# Altium PCB board_a.pcbdoc
Units mil, origin at the board's own origin, x right, y up, seen from the top; angles counter-clockwise.
Board outline 3937.01 x 4409.45 mil, 4 copper layers (Top Layer, In1.Cu, In2.Cu, Bottom Layer), stack 2.757 mil thick; 194 components, 98 nets, 535 pads, 281 vias.
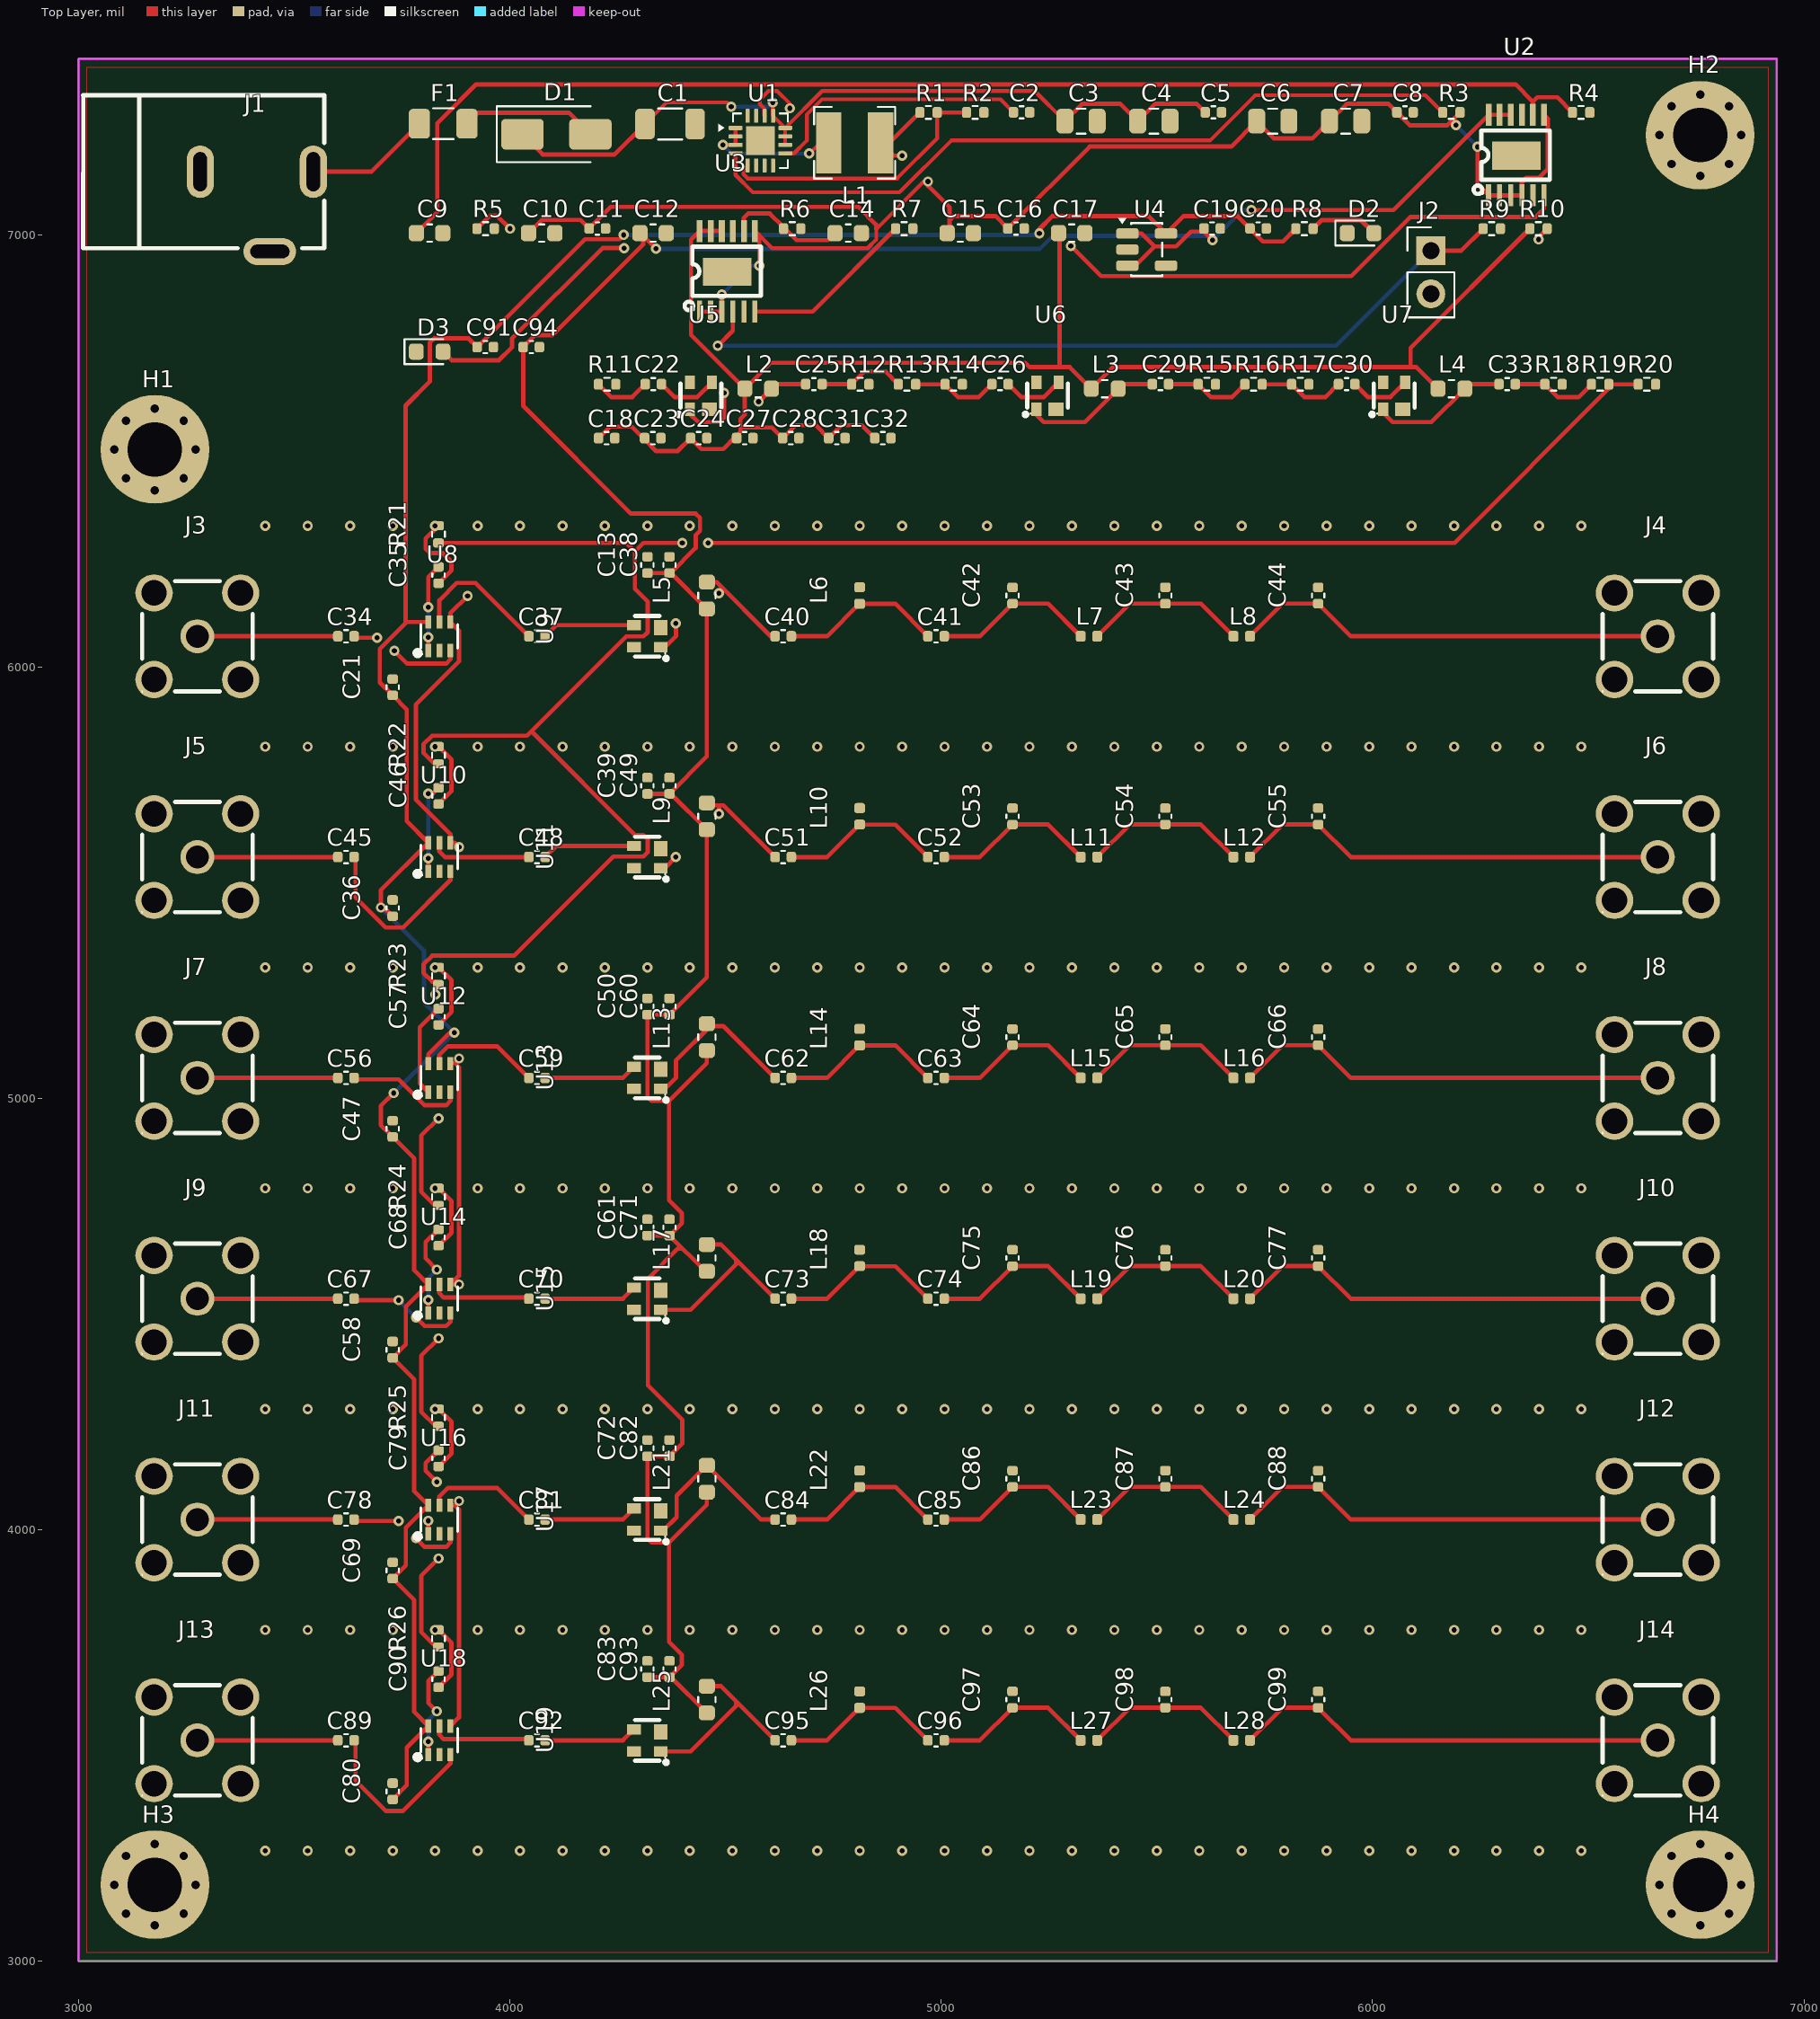
[diagram p0: Top Layer view]
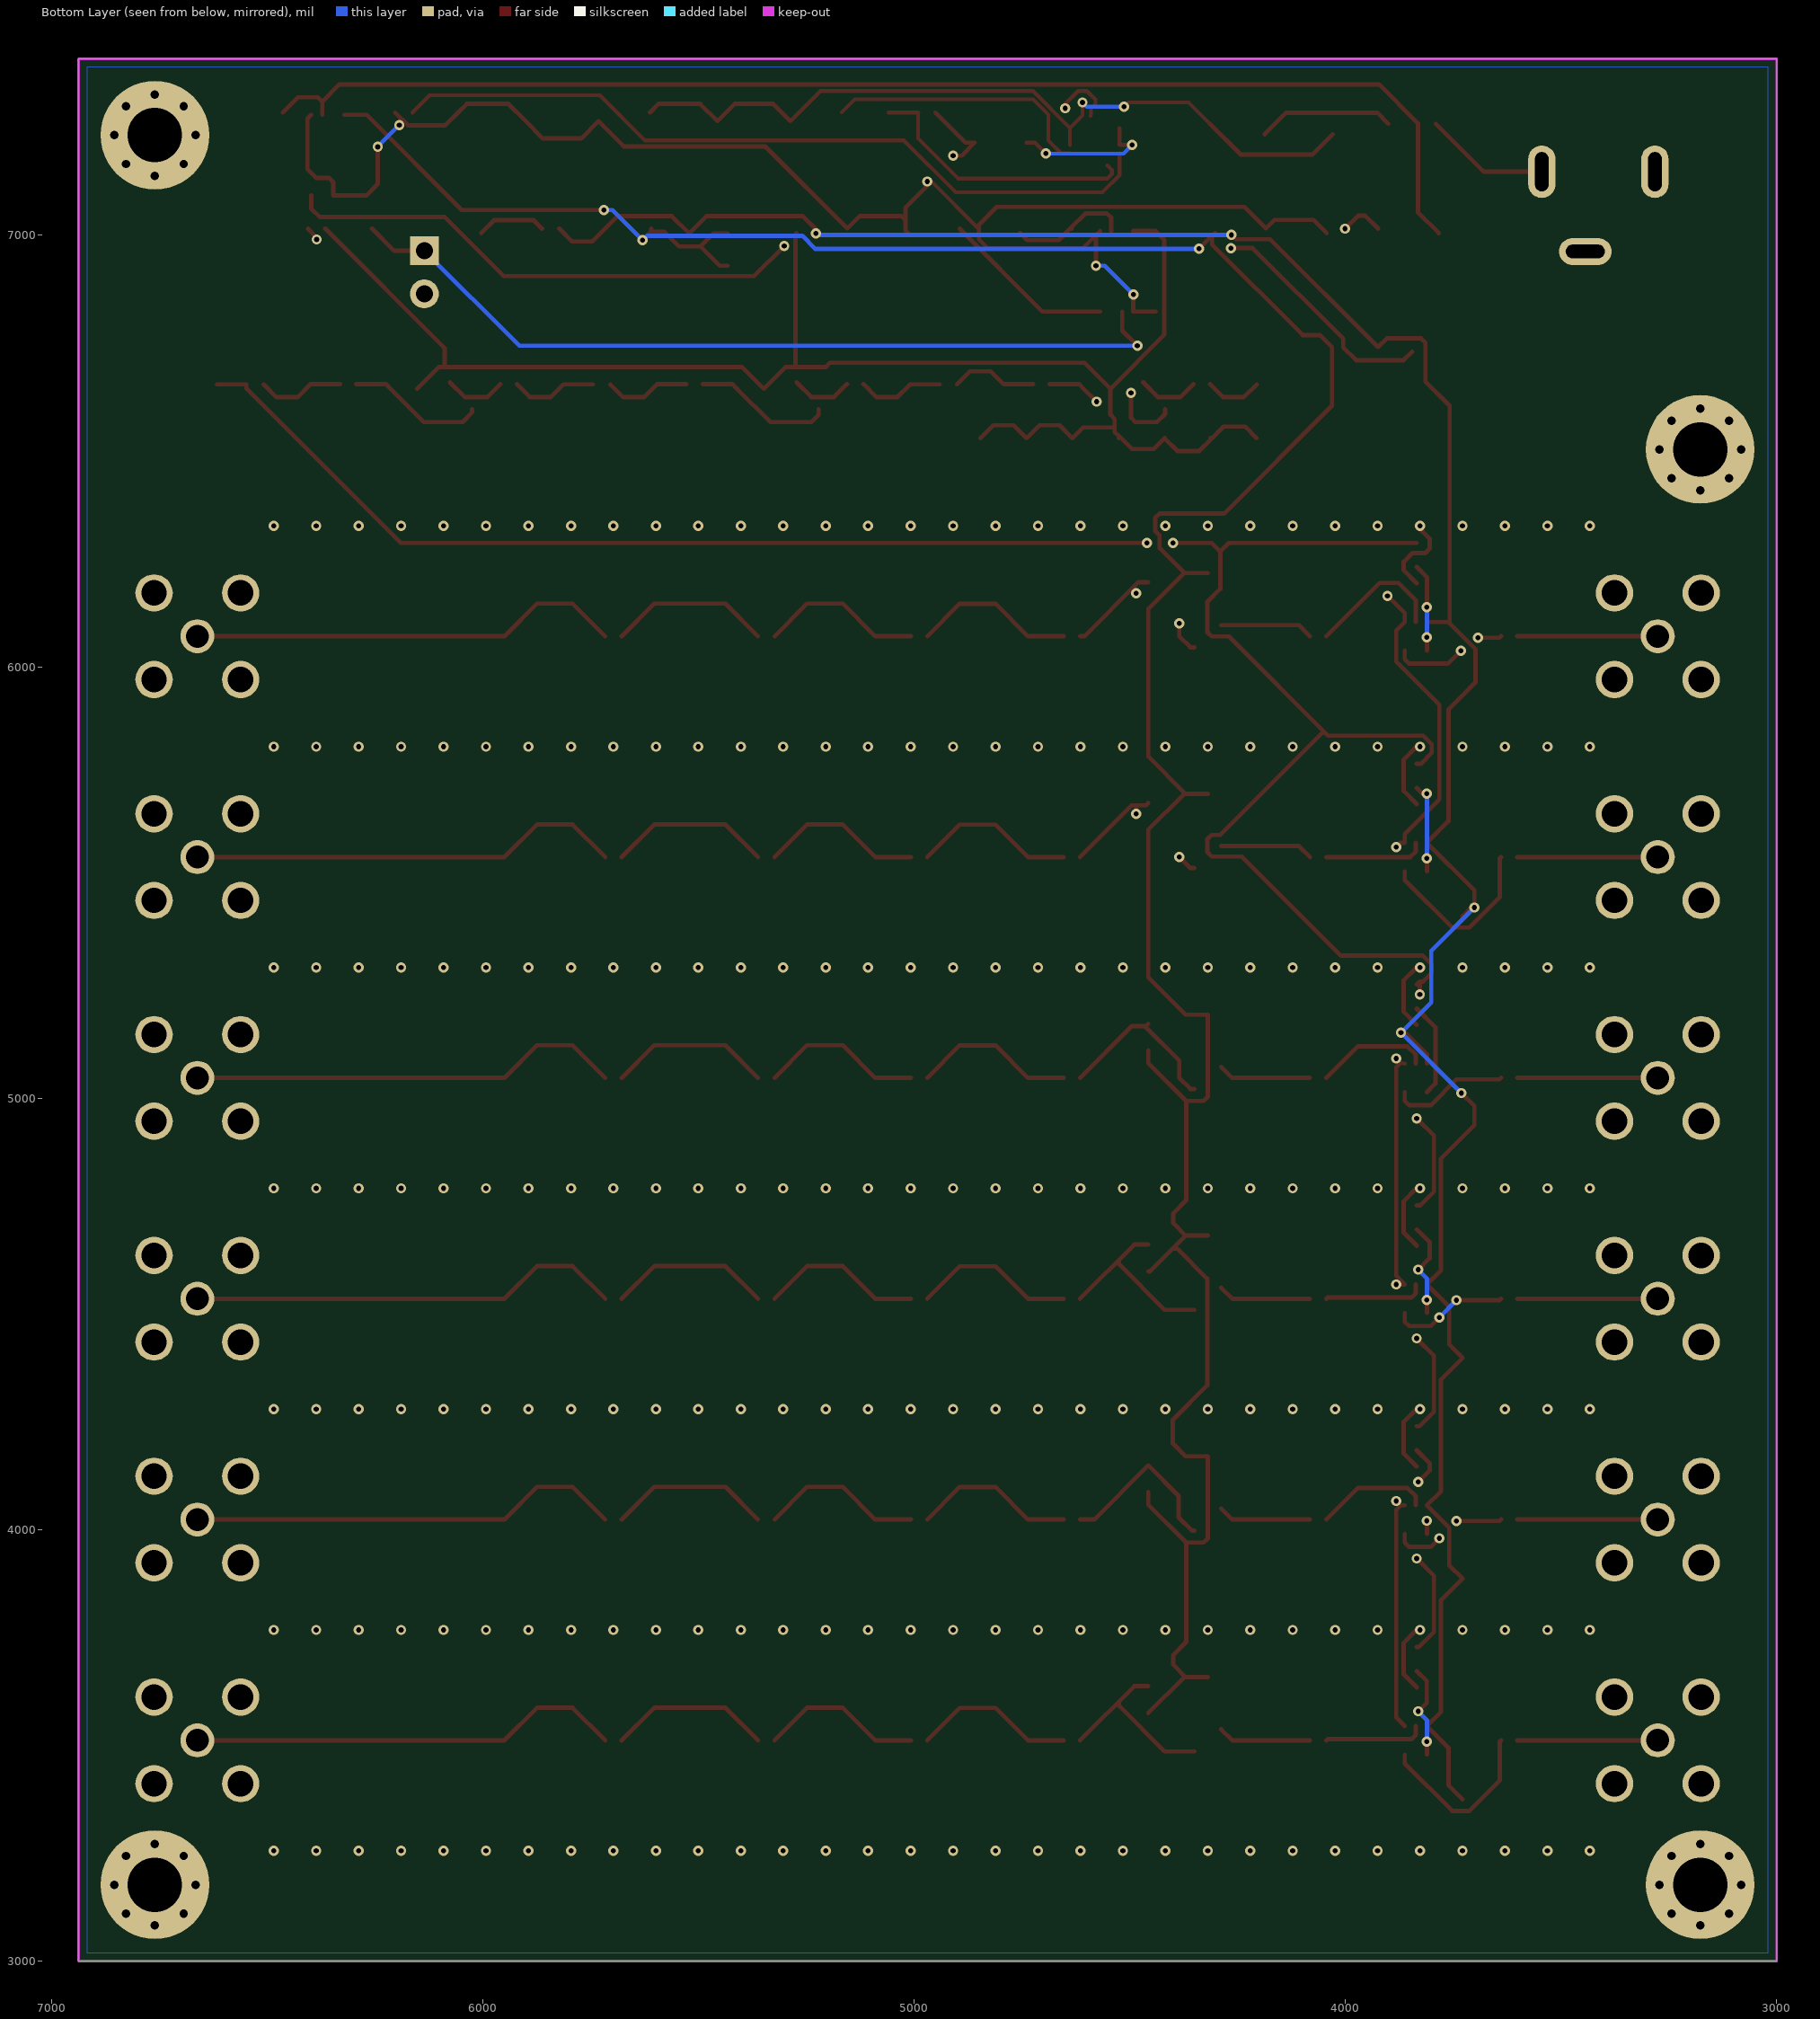
[diagram p1: Bottom Layer view, seen from below]
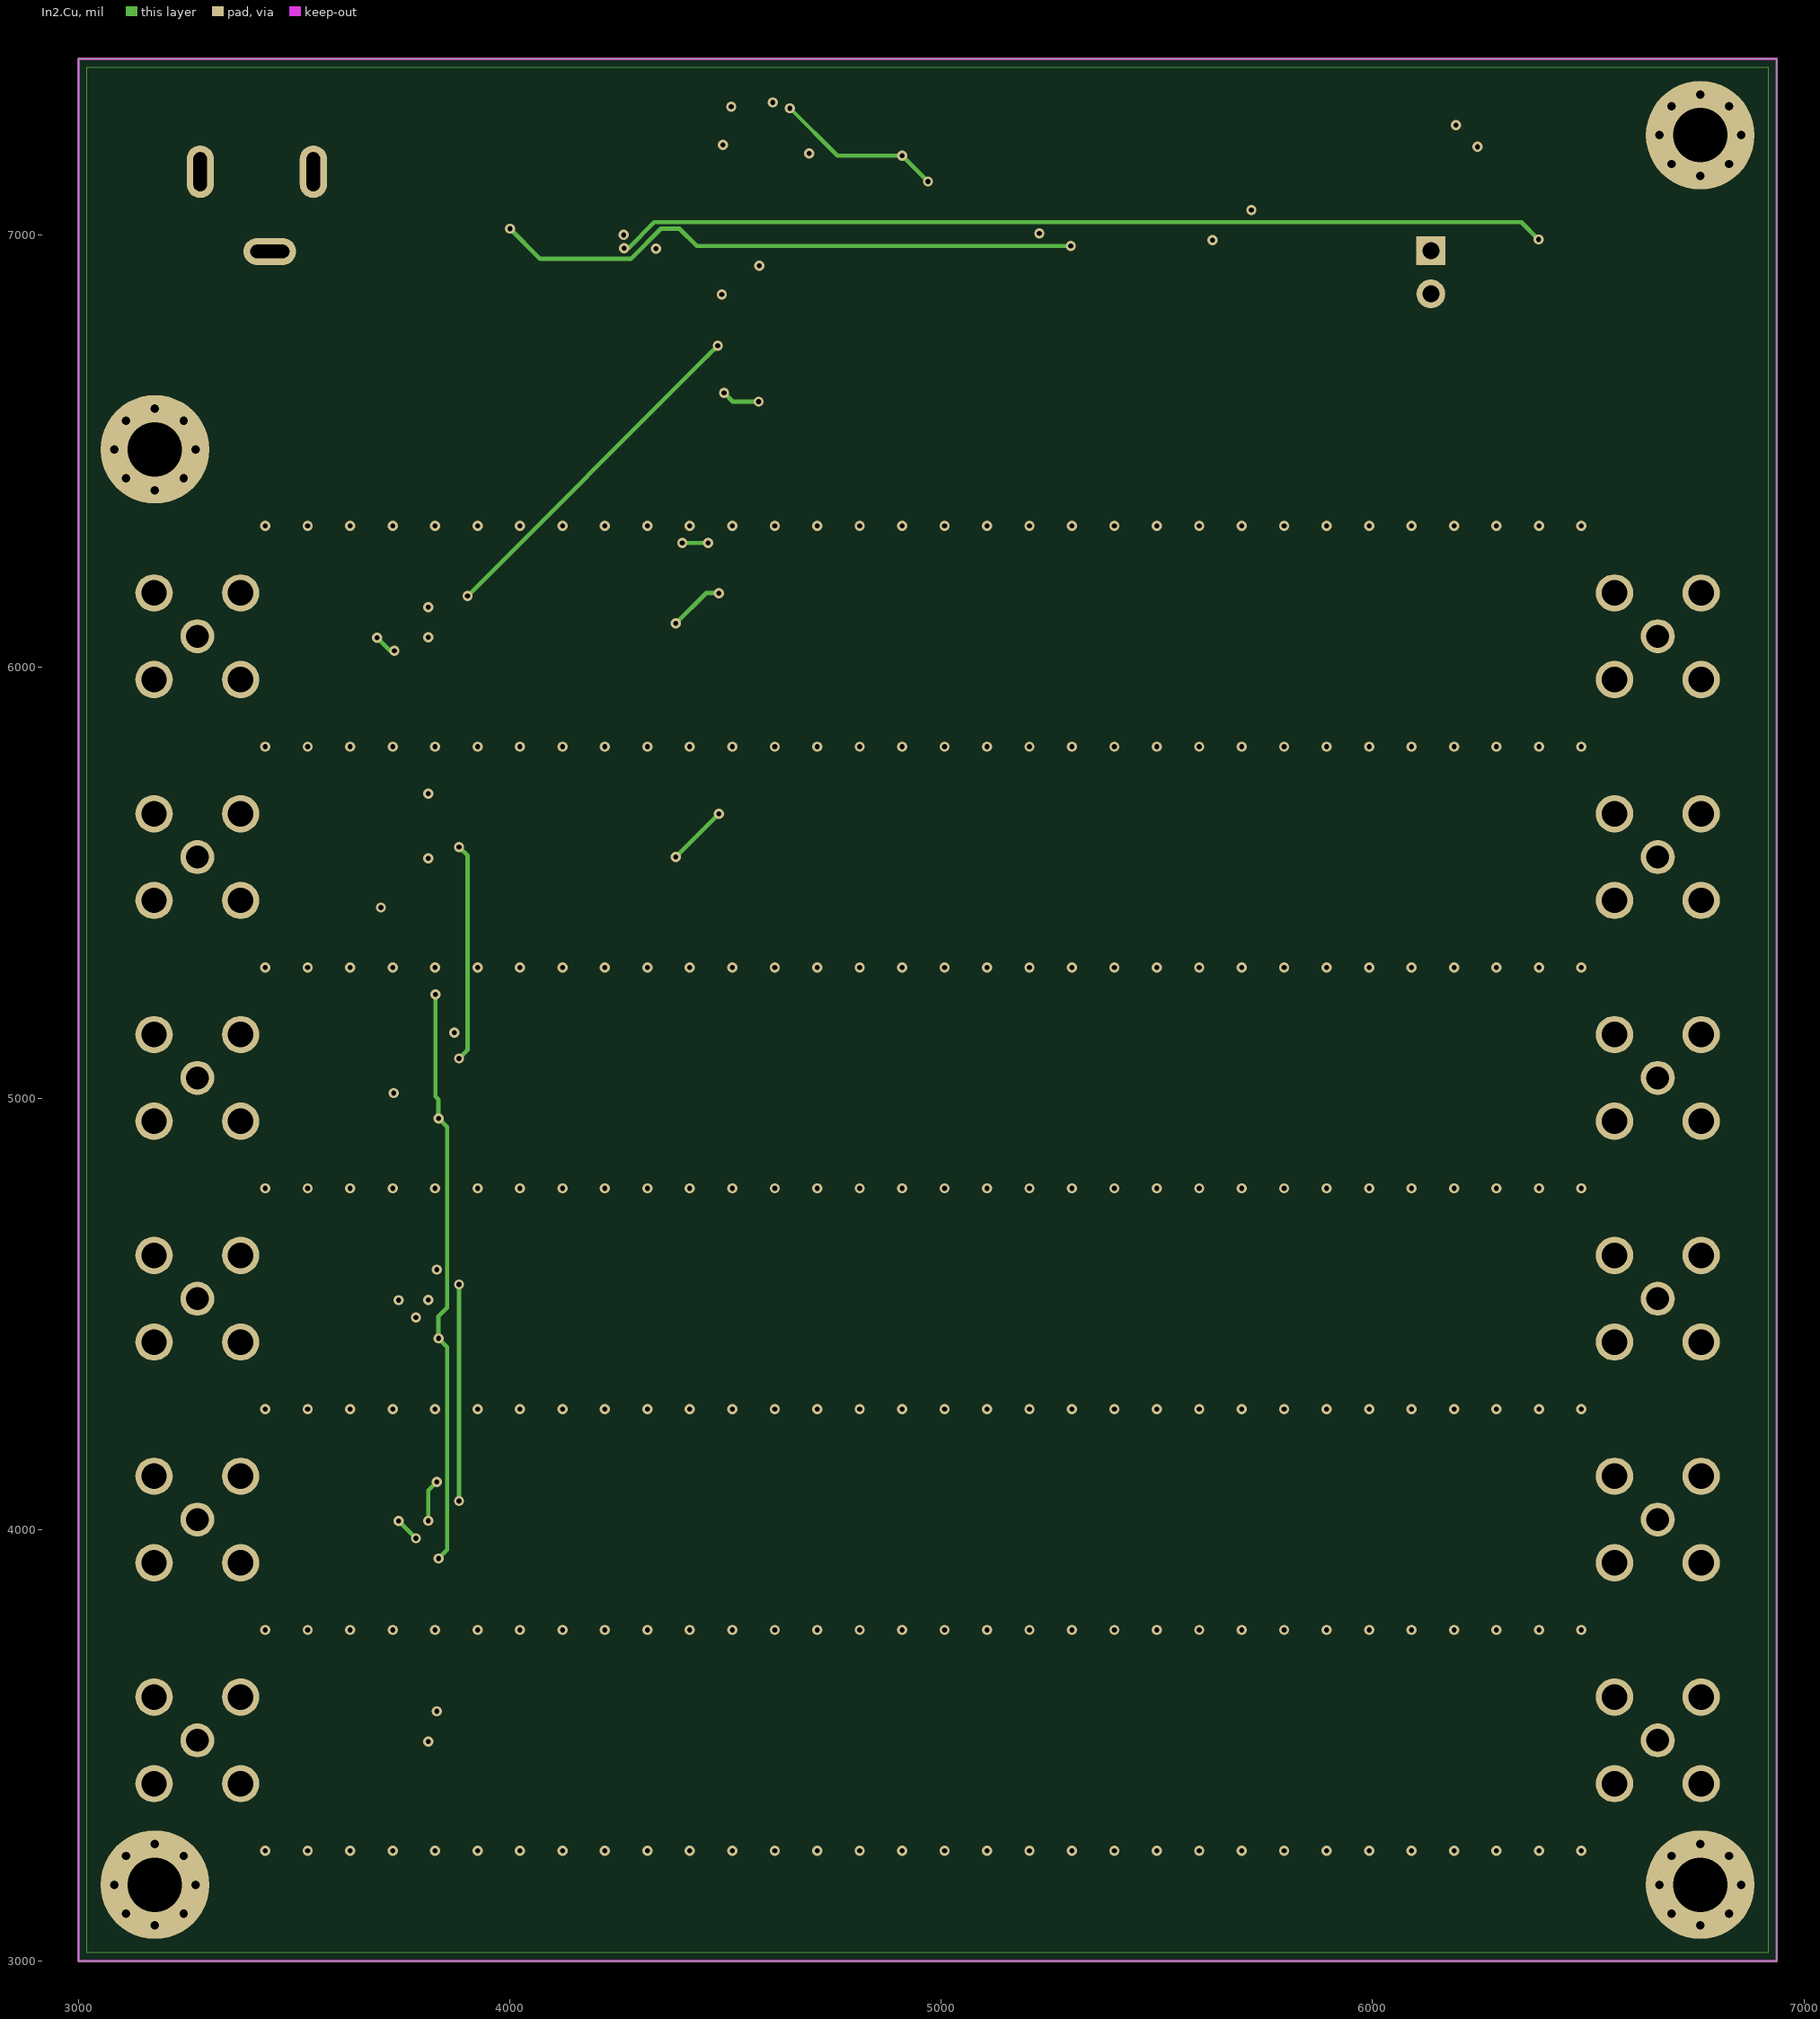
[diagram p2: In2.Cu]

## Layer stack, top to bottom
Top Solder Mask Layer: solder mask 0.394, Dk 3.3
Top Layer: signal copper 1.379
In1.Cu: signal copper (thickness not stored)
In2.Cu: signal copper (thickness not stored)
Bottom Layer: signal copper 1.378
Bottom Solder Mask Layer: solder mask 0.394, Dk 3.3

## Board outline
6937.01,3000 3000,3000 3000,7409.45 6937.01,7409.45

## Design rules (kind name [scope] priority, off if disabled: settings)
BoardOutlineClearance copperThickness1oz [All] p0: genericclearance=10 ignorepadtopadclearanceinfootprint=FALSE except(0: Arc-SplitContinuation Track-SplitContinuation SMDPad-SplitContinuation THPad-SplitContinuation Via-SplitContinuation Fill-SplitContinuation Poly-SplitContinuation Region-SplitContinuation Text-SplitContinuation)
BoardOutlineClearance otherClearance [All] p0: genericclearance=10 ignorepadtopadclearanceinfootprint=FALSE except(0: Arc-SplitContinuation Track-SplitContinuation SMDPad-SplitContinuation THPad-SplitContinuation Via-SplitContinuation Fill-SplitContinuation Poly-SplitContinuation Region-SplitContinuation Text-SplitContinuation)
Clearance copperThickness1oz [All] p1: gap=7 ignorepadtopadclearanceinfootprint=FALSE
Clearance otherClearance [All] p1: gap=7 ignorepadtopadclearanceinfootprint=FALSE
DiffPairsRouting differentialPair [All] p1: maxuncoupledlength=10 minlimit=5 maxlimit=Infinity mostfreqgap=6 toplayer_minwidth=5 toplayer_prefwidth=100 toplayer_maxwidth=100 bottomlayer_minwidth=5 bottomlayer_prefwidth=100 bottomlayer_maxwidth=100 midlayer1_minwidth=5 midlayer1_prefwidth=100 midlayer1_maxwidth=100 midlayer2_minwidth=5 midlayer2_prefwidth=100 midlayer2_maxwidth=100
PasteMaskExpansion pad_to_mask_clearance [All] p1: expansion=0
PlaneConnect innerPlane [All] p1: planeconnectstyle=Relief reliefexpansion=20 reliefentries=4 reliefconductorwidth=10 reliefairgap=10
PolygonConnect copper0 [All] p1: connectstyle=Relief reliefentries=4 reliefconductorwidth=11.811 polygonreliefangle="90 Angle" airgapwidth=9.8425
RoutingVias viaSize [All] p1: viastyle="Through Hole" holewidth=11.811 minholewidth=7.874 maxholewidth=236.2204 width=11.811 minwidth=7.874 maxwidth=236.2204
SolderMaskExpansion pad_to_mask_clearance [IsVia] p1: useseparateexpansions=TRUE expansion=-1000 expansionbottom=-1000
SolderMaskExpansion pad_to_mask_clearance [All] p2: useseparateexpansions=TRUE expansion=0 expansionbottom=0
Width copperThickness1oz [All] p1: maxlimit=100 minlimit=5 preferedwidth=10

## Components (designator, comment, footprint, x,y, rotation, side; value= is the part's Value field where it differs from the comment)
C1 "22u" Capacitor_SMD:C_1206_3216Metric 4371.46,7258.07 r0 top
C2 "3.3n" Capacitor_SMD:C_0402_1005Metric 5186.42,7285.24 r0 top
C3 "10u" Capacitor_SMD:C_0805_2012Metric 5324.21,7264.76 r0 top
C4 "10u" Capacitor_SMD:C_0805_2012Metric 5493.11,7264.76 r0 top
C5 "100n" Capacitor_SMD:C_0402_1005Metric 5630.91,7285.24 r0 top
C6 "22u" Capacitor_SMD:C_0805_2012Metric 5768.7,7264.76 r0 top
C7 "22u" Capacitor_SMD:C_0805_2012Metric 5937.6,7264.76 r0 top
C8 "100n" Capacitor_SMD:C_0402_1005Metric 6075.39,7285.24 r0 top
C9 "4.7u" Capacitor_SMD:C_0603_1608Metric 3813.98,7005.31 r0 top
C10 "10u" Capacitor_SMD:C_0603_1608Metric 4073.82,7005.31 r0 top
C11 "100n" Capacitor_SMD:C_0402_1005Metric 4202.95,7015.94 r0 top
C12 "10u" Capacitor_SMD:C_0603_1608Metric 4332.09,7005.31 r0 top
C13 "100n" Capacitor_SMD:C_0402_1005Metric 4318.9,6236.22 r90 top
C14 "4.7u" Capacitor_SMD:C_0603_1608Metric 4784.45,7005.31 r0 top
C15 "10u" Capacitor_SMD:C_0603_1608Metric 5044.29,7005.31 r0 top
C16 "100n" Capacitor_SMD:C_0402_1005Metric 5173.43,7015.94 r0 top
C17 "10u" Capacitor_SMD:C_0603_1608Metric 5302.56,7005.31 r0 top
C18 "100n" Capacitor_SMD:C_0402_1005Metric 4224.61,6530.12 r0 top
C19 "1u" Capacitor_SMD:C_0402_1005Metric 5628.15,7015.94 r0 top
C20 "1u" Capacitor_SMD:C_0402_1005Metric 5734.84,7015.94 r0 top
C21 "100n" Capacitor_SMD:C_0402_1005Metric 3728.35,5952.76 r90 top
C22 "100p" Capacitor_SMD:C_0402_1005Metric 4332.87,6655.31 r0 top
C23 "100p" Capacitor_SMD:C_0402_1005Metric 4331.3,6530.12 r0 top
C24 "100n" Capacitor_SMD:C_0402_1005Metric 4437.99,6530.12 r0 top
C25 "100p" Capacitor_SMD:C_0402_1005Metric 4704.92,6655.31 r0 top
C26 "100p" Capacitor_SMD:C_0402_1005Metric 5136.42,6655.31 r0 top
C27 "100p" Capacitor_SMD:C_0402_1005Metric 4544.69,6530.12 r0 top
C28 "100n" Capacitor_SMD:C_0402_1005Metric 4651.38,6530.12 r0 top
C29 "100p" Capacitor_SMD:C_0402_1005Metric 5508.46,6655.31 r0 top
C30 "100p" Capacitor_SMD:C_0402_1005Metric 5939.96,6655.31 r0 top
C31 "100p" Capacitor_SMD:C_0402_1005Metric 4758.07,6530.12 r0 top
C32 "100n" Capacitor_SMD:C_0402_1005Metric 4864.76,6530.12 r0 top
C33 "100p" Capacitor_SMD:C_0402_1005Metric 6312.01,6655.31 r0 top
C34 "100p" Capacitor_SMD:C_0402_1005Metric 3620.08,6070.87 r0 top
C35 "100p" Capacitor_SMD:C_0402_1005Metric 3834.65,6212.6 r90 top
C36 "100p" Capacitor_SMD:C_0402_1005Metric 3728.35,5440.94 r90 top
C37 "100p" Capacitor_SMD:C_0402_1005Metric 4062.99,6070.87 r0 top
C38 "100p" Capacitor_SMD:C_0402_1005Metric 4370.08,6236.22 r90 top
C39 "100n" Capacitor_SMD:C_0402_1005Metric 4318.9,5724.41 r90 top
C40 "7.5p" Capacitor_SMD:C_0402_1005Metric 4633.86,6070.87 r0 top
C41 "7.5p" Capacitor_SMD:C_0402_1005Metric 4988.19,6070.87 r0 top
C42 "4.7p" Capacitor_SMD:C_0402_1005Metric 5165.35,6165.35 r90 top
C43 "8.2p" Capacitor_SMD:C_0402_1005Metric 5519.69,6165.35 r90 top
C44 "4.7p" Capacitor_SMD:C_0402_1005Metric 5874.02,6165.35 r90 top
C45 "100p" Capacitor_SMD:C_0402_1005Metric 3620.08,5559.06 r0 top
C46 "100p" Capacitor_SMD:C_0402_1005Metric 3834.65,5700.79 r90 top
C47 "100p" Capacitor_SMD:C_0402_1005Metric 3728.35,4929.13 r90 top
C48 "100p" Capacitor_SMD:C_0402_1005Metric 4062.99,5559.06 r0 top
C49 "100p" Capacitor_SMD:C_0402_1005Metric 4370.08,5724.41 r90 top
C50 "100n" Capacitor_SMD:C_0402_1005Metric 4318.9,5212.6 r90 top
C51 "7.5p" Capacitor_SMD:C_0402_1005Metric 4633.86,5559.06 r0 top
C52 "7.5p" Capacitor_SMD:C_0402_1005Metric 4988.19,5559.06 r0 top
C53 "4.7p" Capacitor_SMD:C_0402_1005Metric 5165.35,5653.54 r90 top
C54 "8.2p" Capacitor_SMD:C_0402_1005Metric 5519.69,5653.54 r90 top
C55 "4.7p" Capacitor_SMD:C_0402_1005Metric 5874.02,5653.54 r90 top
C56 "100p" Capacitor_SMD:C_0402_1005Metric 3620.08,5047.24 r0 top
C57 "100p" Capacitor_SMD:C_0402_1005Metric 3834.65,5188.98 r90 top
C58 "100p" Capacitor_SMD:C_0402_1005Metric 3728.35,4417.32 r90 top
C59 "100p" Capacitor_SMD:C_0402_1005Metric 4062.99,5047.24 r0 top
C60 "100p" Capacitor_SMD:C_0402_1005Metric 4370.08,5212.6 r90 top
C61 "100n" Capacitor_SMD:C_0402_1005Metric 4318.9,4700.79 r90 top
C62 "7.5p" Capacitor_SMD:C_0402_1005Metric 4633.86,5047.24 r0 top
C63 "7.5p" Capacitor_SMD:C_0402_1005Metric 4988.19,5047.24 r0 top
C64 "4.7p" Capacitor_SMD:C_0402_1005Metric 5165.35,5141.73 r90 top
C65 "8.2p" Capacitor_SMD:C_0402_1005Metric 5519.69,5141.73 r90 top
C66 "4.7p" Capacitor_SMD:C_0402_1005Metric 5874.02,5141.73 r90 top
C67 "100p" Capacitor_SMD:C_0402_1005Metric 3620.08,4535.43 r0 top
C68 "100p" Capacitor_SMD:C_0402_1005Metric 3834.65,4677.17 r90 top
C69 "100p" Capacitor_SMD:C_0402_1005Metric 3728.35,3905.51 r90 top
C70 "100p" Capacitor_SMD:C_0402_1005Metric 4062.99,4535.43 r0 top
C71 "100p" Capacitor_SMD:C_0402_1005Metric 4370.08,4700.79 r90 top
C72 "100n" Capacitor_SMD:C_0402_1005Metric 4318.9,4188.98 r90 top
C73 "7.5p" Capacitor_SMD:C_0402_1005Metric 4633.86,4535.43 r0 top
C74 "7.5p" Capacitor_SMD:C_0402_1005Metric 4988.19,4535.43 r0 top
C75 "4.7p" Capacitor_SMD:C_0402_1005Metric 5165.35,4629.92 r90 top
C76 "8.2p" Capacitor_SMD:C_0402_1005Metric 5519.69,4629.92 r90 top
C77 "4.7p" Capacitor_SMD:C_0402_1005Metric 5874.02,4629.92 r90 top
C78 "100p" Capacitor_SMD:C_0402_1005Metric 3620.08,4023.62 r0 top
C79 "100p" Capacitor_SMD:C_0402_1005Metric 3834.65,4165.35 r90 top
C80 "100p" Capacitor_SMD:C_0402_1005Metric 3728.35,3393.7 r90 top
C81 "100p" Capacitor_SMD:C_0402_1005Metric 4062.99,4023.62 r0 top
C82 "100p" Capacitor_SMD:C_0402_1005Metric 4370.08,4188.98 r90 top
C83 "100n" Capacitor_SMD:C_0402_1005Metric 4318.9,3677.17 r90 top
C84 "7.5p" Capacitor_SMD:C_0402_1005Metric 4633.86,4023.62 r0 top
C85 "7.5p" Capacitor_SMD:C_0402_1005Metric 4988.19,4023.62 r0 top
C86 "4.7p" Capacitor_SMD:C_0402_1005Metric 5165.35,4118.11 r90 top
C87 "8.2p" Capacitor_SMD:C_0402_1005Metric 5519.69,4118.11 r90 top
C88 "4.7p" Capacitor_SMD:C_0402_1005Metric 5874.02,4118.11 r90 top
C89 "100p" Capacitor_SMD:C_0402_1005Metric 3620.08,3511.81 r0 top
C90 "100p" Capacitor_SMD:C_0402_1005Metric 3834.65,3653.54 r90 top
C91 "100p" Capacitor_SMD:C_0402_1005Metric 3943.11,6741.14 r0 top
C92 "100p" Capacitor_SMD:C_0402_1005Metric 4062.99,3511.81 r0 top
C93 "100p" Capacitor_SMD:C_0402_1005Metric 4370.08,3677.17 r90 top
C94 "100n" Capacitor_SMD:C_0402_1005Metric 4049.8,6741.14 r0 top
C95 "7.5p" Capacitor_SMD:C_0402_1005Metric 4633.86,3511.81 r0 top
C96 "7.5p" Capacitor_SMD:C_0402_1005Metric 4988.19,3511.81 r0 top
C97 "4.7p" Capacitor_SMD:C_0402_1005Metric 5165.35,3606.3 r90 top
C98 "8.2p" Capacitor_SMD:C_0402_1005Metric 5519.69,3606.3 r90 top
C99 "4.7p" Capacitor_SMD:C_0402_1005Metric 5874.02,3606.3 r90 top
D1 "SS34" Diode_SMD:D_SMA 4108.07,7234.45 r0 top
D2 "green" LED_SMD:LED_0603_1608Metric 5972.24,7005.31 r0 top
D3 "yellow" LED_SMD:LED_0603_1608Metric 3813.98,6730.51 r0 top
F1 "1.5A" Fuse:Fuse_1206_3216Metric 3845.47,7258.86 r0 top
H1 "M3" MountingHole:MountingHole_3.2mm_M3_Pad_Via 3177.17,6503.94 r0 top
H2 "M3" MountingHole:MountingHole_3.2mm_M3_Pad_Via 6759.84,7232.28 r0 top
H3 "M3" MountingHole:MountingHole_3.2mm_M3_Pad_Via 3177.17,3177.17 r0 top
H4 "M3" MountingHole:MountingHole_3.2mm_M3_Pad_Via 6759.84,3177.17 r0 top
J1 "12V DC" prc:DC-IN-TH_DC-005C-20A 3413.39,7055.12 r0 top
J2 "CAL_EN" Connector_PinHeader_2.54mm:PinHeader_1x02_P2.54mm_Vertical 6135.24,6964.37 r0 top
J3 "ANT0" prc:SMA-TH_BWSMA-KE-Z001 3275.59,6070.87 r0 top
J4 "OUT0" prc:SMA-TH_BWSMA-KE-Z001 6661.42,6070.87 r0 top
J5 "ANT1" prc:SMA-TH_BWSMA-KE-Z001 3275.59,5559.06 r0 top
J6 "OUT1" prc:SMA-TH_BWSMA-KE-Z001 6661.42,5559.06 r0 top
J7 "ANT2" prc:SMA-TH_BWSMA-KE-Z001 3275.59,5047.24 r0 top
J8 "OUT2" prc:SMA-TH_BWSMA-KE-Z001 6661.42,5047.24 r0 top
J9 "ANT3" prc:SMA-TH_BWSMA-KE-Z001 3275.59,4535.43 r0 top
J10 "OUT3" prc:SMA-TH_BWSMA-KE-Z001 6661.42,4535.43 r0 top
J11 "ANT4" prc:SMA-TH_BWSMA-KE-Z001 3275.59,4023.62 r0 top
J12 "OUT4" prc:SMA-TH_BWSMA-KE-Z001 6661.42,4023.62 r0 top
J13 "ANT5" prc:SMA-TH_BWSMA-KE-Z001 3275.59,3511.81 r0 top
J14 "OUT5" prc:SMA-TH_BWSMA-KE-Z001 6661.42,3511.81 r0 top
L1 "2.2u" Inductor_SMD:L_Bourns-SRN4018 4799.41,7214.76 r0 top
L2 "220n" Inductor_SMD:L_0603_1608Metric 4575.79,6644.69 r0 top
L3 "220n" Inductor_SMD:L_0603_1608Metric 5379.33,6644.69 r0 top
L4 "220n" Inductor_SMD:L_0603_1608Metric 6182.87,6644.69 r0 top
L5 "220n" Inductor_SMD:L_0603_1608Metric 4456.69,6165.35 r90 top
L6 "15n" Inductor_SMD:L_0402_1005Metric 4811.02,6165.35 r90 top
L7 "15n" Inductor_SMD:L_0402_1005Metric 5342.52,6070.87 r0 top
L8 "15n" Inductor_SMD:L_0402_1005Metric 5696.85,6070.87 r0 top
L9 "220n" Inductor_SMD:L_0603_1608Metric 4456.69,5653.54 r90 top
L10 "15n" Inductor_SMD:L_0402_1005Metric 4811.02,5653.54 r90 top
L11 "15n" Inductor_SMD:L_0402_1005Metric 5342.52,5559.06 r0 top
L12 "15n" Inductor_SMD:L_0402_1005Metric 5696.85,5559.06 r0 top
L13 "220n" Inductor_SMD:L_0603_1608Metric 4456.69,5141.73 r90 top
L14 "15n" Inductor_SMD:L_0402_1005Metric 4811.02,5141.73 r90 top
L15 "15n" Inductor_SMD:L_0402_1005Metric 5342.52,5047.24 r0 top
L16 "15n" Inductor_SMD:L_0402_1005Metric 5696.85,5047.24 r0 top
L17 "220n" Inductor_SMD:L_0603_1608Metric 4456.69,4629.92 r90 top
L18 "15n" Inductor_SMD:L_0402_1005Metric 4811.02,4629.92 r90 top
L19 "15n" Inductor_SMD:L_0402_1005Metric 5342.52,4535.43 r0 top
L20 "15n" Inductor_SMD:L_0402_1005Metric 5696.85,4535.43 r0 top
L21 "220n" Inductor_SMD:L_0603_1608Metric 4456.69,4118.11 r90 top
L22 "15n" Inductor_SMD:L_0402_1005Metric 4811.02,4118.11 r90 top
L23 "15n" Inductor_SMD:L_0402_1005Metric 5342.52,4023.62 r0 top
L24 "15n" Inductor_SMD:L_0402_1005Metric 5696.85,4023.62 r0 top
L25 "220n" Inductor_SMD:L_0603_1608Metric 4456.69,3606.3 r90 top
L26 "15n" Inductor_SMD:L_0402_1005Metric 4811.02,3606.3 r90 top
L27 "15n" Inductor_SMD:L_0402_1005Metric 5342.52,3511.81 r0 top
L28 "15n" Inductor_SMD:L_0402_1005Metric 5696.85,3511.81 r0 top
R1 "600k" Resistor_SMD:R_0402_1005Metric 4970.67,7284.84 r0 top
R2 "100k" Resistor_SMD:R_0402_1005Metric 5078.94,7284.84 r0 top
R3 "100k" Resistor_SMD:R_0402_1005Metric 6182.87,7284.84 r0 top
R4 "50.0k" Resistor_SMD:R_0402_1005Metric 6483.66,7284.84 r0 top
R5 "300" Resistor_SMD:R_0402_1005Metric 3943.9,7015.55 r0 top
R6 "50.0k" Resistor_SMD:R_0402_1005Metric 4654.53,7015.55 r0 top
R7 "300" Resistor_SMD:R_0402_1005Metric 4914.37,7015.55 r0 top
R8 "4.7k" Resistor_SMD:R_0402_1005Metric 5842.32,7015.55 r0 top
R9 "100k" Resistor_SMD:R_0402_1005Metric 6276.57,7015.55 r0 top
R10 "4.7k" Resistor_SMD:R_0402_1005Metric 6384.84,7015.55 r0 top
R11 "49.9" Resistor_SMD:R_0402_1005Metric 4225.39,6654.92 r0 top
R12 "294" Resistor_SMD:R_0402_1005Metric 4812.4,6654.92 r0 top
R13 "17.8" Resistor_SMD:R_0402_1005Metric 4920.67,6654.92 r0 top
R14 "294" Resistor_SMD:R_0402_1005Metric 5028.94,6654.92 r0 top
R15 "294" Resistor_SMD:R_0402_1005Metric 5615.94,6654.92 r0 top
R16 "17.8" Resistor_SMD:R_0402_1005Metric 5724.21,6654.92 r0 top
R17 "294" Resistor_SMD:R_0402_1005Metric 5832.48,6654.92 r0 top
R18 "294" Resistor_SMD:R_0402_1005Metric 6419.49,6654.92 r0 top
R19 "17.8" Resistor_SMD:R_0402_1005Metric 6527.76,6654.92 r0 top
R20 "294" Resistor_SMD:R_0402_1005Metric 6636.02,6654.92 r0 top
R21 "35.7" Resistor_SMD:R_0402_1005Metric 3834.65,6307.09 r90 top
R22 "35.7" Resistor_SMD:R_0402_1005Metric 3834.65,5795.28 r90 top
R23 "35.7" Resistor_SMD:R_0402_1005Metric 3834.65,5283.46 r90 top
R24 "35.7" Resistor_SMD:R_0402_1005Metric 3834.65,4771.65 r90 top
R25 "35.7" Resistor_SMD:R_0402_1005Metric 3834.65,4259.84 r90 top
R26 "35.7" Resistor_SMD:R_0402_1005Metric 3834.65,3748.03 r90 top
U1 "TPS62130RGTR" Package_DFN_QFN:VQFN-16-1EP_3x3mm_P0.5mm_EP1.68x1.68mm 4580.91,7219.49 r0 top
U2 "LT3045EMSE" prc:MSOP-12_L4.0-W3.0-P0.65-LS4.9-BL-EP 6333.27,7186.22 r0 top
U3 "LT3045EMSE" prc:MSOP-12_L4.0-W3.0-P0.65-LS4.9-BL-EP 4504.13,6916.93 r0 top
U4 "TLV75533PDBVR" Package_TO_SOT_SMD:SOT-23-5 5476.57,6967.13 r0 top
U5 "SPF5043Z" prc:SOT343_L2.0-W1.3-P1.30-LS2.1-BL 4443.11,6628.35 r0 top
U6 "SPF5043Z" prc:SOT343_L2.0-W1.3-P1.30-LS2.1-BL 5246.65,6628.35 r0 top
U7 "SPF5043Z" prc:SOT343_L2.0-W1.3-P1.30-LS2.1-BL 6050.2,6628.35 r0 top
U8 "PE4259-63" prc:SC-70-6_L2.2-W1.3-P0.65-LS2.1-BL 3836.61,6070.87 r0 top
U9 "SPF5043Z" prc:SOT343_L2.0-W1.3-P1.30-LS2.1-BL 4318.9,6070.87 r90 top
U10 "PE4259-63" prc:SC-70-6_L2.2-W1.3-P0.65-LS2.1-BL 3836.61,5559.06 r0 top
U11 "SPF5043Z" prc:SOT343_L2.0-W1.3-P1.30-LS2.1-BL 4318.9,5559.06 r90 top
U12 "PE4259-63" prc:SC-70-6_L2.2-W1.3-P0.65-LS2.1-BL 3836.61,5047.24 r0 top
U13 "SPF5043Z" prc:SOT343_L2.0-W1.3-P1.30-LS2.1-BL 4318.9,5047.24 r90 top
U14 "PE4259-63" prc:SC-70-6_L2.2-W1.3-P0.65-LS2.1-BL 3836.61,4535.43 r0 top
U15 "SPF5043Z" prc:SOT343_L2.0-W1.3-P1.30-LS2.1-BL 4318.9,4535.43 r90 top
U16 "PE4259-63" prc:SC-70-6_L2.2-W1.3-P0.65-LS2.1-BL 3836.61,4023.62 r0 top
U17 "SPF5043Z" prc:SOT343_L2.0-W1.3-P1.30-LS2.1-BL 4318.9,4023.62 r90 top
U18 "PE4259-63" prc:SC-70-6_L2.2-W1.3-P0.65-LS2.1-BL 3836.61,3511.81 r0 top
U19 "SPF5043Z" prc:SOT343_L2.0-W1.3-P1.30-LS2.1-BL 4318.9,3511.81 r90 top

## Footprints (in the part's own frame and the unit in brackets; to place one, negate y for a bottom-side part, rotate by r counter-clockwise, add the part's x,y. Pads: shape width x height; smd on the part's side, far side on the other; paste and mask are expansions set on the pad)
Capacitor_SMD:C_0402_1005Metric [mm]
  rrect50% 0.56x0.62 smd: 1(-0.48,0) 2(0.48,0)
  silkscreen extent -0.11,-0.36 0.11,0.36
Capacitor_SMD:C_0603_1608Metric [mm]
  rrect50% 0.9x0.95 smd: 1(-0.775,0) 2(0.775,0)
  silkscreen extent -0.14,-0.51 0.14,0.51
Capacitor_SMD:C_0805_2012Metric [mm]
  rrect50% 1x1.45 smd: 1(-0.95,0) 2(0.95,0)
  silkscreen extent -0.26,-0.73 0.26,0.73
Capacitor_SMD:C_1206_3216Metric [mm]
  rrect43% 1.15x1.8 smd: 1(-1.475,0) 2(1.475,0)
  silkscreen extent -0.71,-0.91 0.71,0.91
Connector_PinHeader_2.54mm:PinHeader_1x02_P2.54mm_Vertical [mm]
  rect 1.7x1.7 hole 1: 1(0,0)
  round 1.7 hole 1: 2(0,-2.54)
  silkscreen extent -1.38,-3.92 1.38,1.38
Diode_SMD:D_SMA [mm]
  rrect27% 2.5x1.8 smd: 1(-2,0) 2(2,0)
  silkscreen extent -3.51,-1.65 2,1.65
Fuse:Fuse_1206_3216Metric [mm]
  rrect40% 1.25x1.75 smd: 1(-1.4,0) 2(1.4,0)
  silkscreen extent -0.6,-0.91 0.6,0.91
Inductor_SMD:L_0402_1005Metric [mm]
  rrect50% 0.59x0.64 smd: 1(-0.485,0) 2(0.485,0)
Inductor_SMD:L_0603_1608Metric [mm]
  rrect50% 0.875x0.95 smd: 1(-0.787,0) 2(0.787,0)
  silkscreen extent -0.16,-0.51 0.16,0.51
Inductor_SMD:L_Bourns-SRN4018 [mm]
  rect 1.5x3.6 smd: 1(-1.525,0) 2(1.525,0)
  silkscreen extent -2.38,-2.11 2.39,2.11
LED_SMD:LED_0603_1608Metric [mm]
  rrect50% 0.875x0.95 smd: 1(-0.788,0) 2(0.787,0)
  silkscreen extent -1.49,-0.73 0.8,0.73
MountingHole:MountingHole_3.2mm_M3_Pad_Via [mm]
  round 0.8 hole 0.5: 1(-2.4,0) 1(-1.697,-1.697) 1(-1.697,1.697) 1(0,-2.4) 1(0,2.4) 1(1.697,-1.697) 1(1.697,1.697) 1(2.4,0)
  round 6.4 hole 3.2: 1(0,0)
Package_DFN_QFN:VQFN-16-1EP_3x3mm_P0.5mm_EP1.68x1.68mm [mm]
  rrect50% 0.825x0.25 smd: 1(-1.462,0.75) 2(-1.462,0.25) 3(-1.462,-0.25) 4(-1.462,-0.75) 9(1.463,-0.75) 10(1.463,-0.25) 11(1.463,0.25) 12(1.463,0.75)
  rrect50% 0.25x0.825 smd: 5(-0.75,-1.462) 6(-0.25,-1.462) 7(0.25,-1.462) 8(0.75,-1.462) 13(0.75,1.462) 14(0.25,1.462) 15(-0.25,1.462) 16(-0.75,1.462)
  rect 1.68x1.68 smd: 17(0,0)
  silkscreen extent -2.47,-1.61 1.61,1.61
Package_TO_SOT_SMD:SOT-23-5 [mm]
  rrect50% 1.325x0.6 smd: 1(-1.138,0.95) 2(-1.138,0) 3(-1.138,-0.95) 4(1.138,-0.95) 5(1.138,0.95)
  silkscreen extent -1.69,-1.56 0.91,1.84
prc:DC-IN-TH_DC-005C-20A [mm]
  oval 1.6x3.1 hole 0.8 slot 2.3 at 90 deg: 1(3.33,2.35) 2(-3.33,2.35)
  oval 3.1x1.6 hole 0.8 slot 2.3 at 0 deg: 3(0.77,-2.35)
  silkscreen extent -10.23,-2.15 4.01,6.88
prc:MSOP-12_L4.0-W3.0-P0.65-LS4.9-BL-EP [mm]
  rect 0.3x1.3 smd: 1(-1.63,-2.37) 2(-0.98,-2.37) 3(-0.32,-2.37) 4(0.33,-2.37) 5(0.98,-2.37) 6(1.63,-2.37)
  rect 0.35x1.3 smd: 7(1.63,2.37) 8(0.98,2.37) 9(0.33,2.37) 10(-0.32,2.37) 11(-0.98,2.37) 12(-1.63,2.37)
  rect 2.85x1.65 smd: 13(0,-0.04)
  silkscreen extent -2.51,-2.3 1.98,1.45
prc:SC-70-6_L2.2-W1.3-P0.65-LS2.1-BL [mm]
  rect 0.35x0.78 smd: 1(-0.65,-0.84) 2(0,-0.84) 3(0.65,-0.84) 4(0.65,0.84) 5(0,0.84) 6(-0.65,0.84)
  silkscreen extent -1.43,-1.14 1.08,0.7
prc:SMA-TH_BWSMA-KE-Z001 [mm]
  round 2.2 hole 1.5: 1(-2.55,-2.55) 2(-2.55,2.55) 3(2.55,2.55) 4(2.55,-2.55)
  round 2 hole 1.35: 5(0,0)
  silkscreen extent -3.28,-3.28 3.25,3.25
prc:SOT343_L2.0-W1.3-P1.30-LS2.1-BL [mm]
  rect 0.599x0.8 smd: 1(-0.65,-0.79) 3(0.65,0.79) 4(-0.65,0.79)
  rect 0.899x0.8 smd: 2(0.5,-0.79)
  silkscreen extent -1.4,-1.2 1.2,0.72
Resistor_SMD:R_0402_1005Metric [mm]
  rrect50% 0.54x0.64 smd: 1(-0.51,0) 2(0.51,0)
  silkscreen extent -0.15,-0.38 0.15,0.38

## Via types
v1: diameter 23.62, hole 11.8, Top Layer to Bottom Layer, 281 vias

## Nets (pads, with @x,y where several pads share a name; then routed paths per layer and width w, separated by ;. In a path a pad name is that pad's centre, name@x,y a point inside that pad or via, vN(x,y) a via of type N, cw(c..) or ccw(c..) an arc to the next point about the centre after c; other vN are vias at no path point)
+3V3: C20.1 C21.1 C36.1 C47.1 C58.1 C69.1 C80.1 C91.1 R8.1 U4.5 U8.6 U10.6 U12.6 U14.6 U16.6 U18.6 | length 6287.9
  Top Layer w10: C80.1 3761.02,3407.48 3761.02,3494.88 U18.6 3778.34,3577.56 3778.34,3836.61 C69.1 3759.01,3917.28 3759.01,4004.68 U16.6 3778.34,4089.37 3778.34,4348.42 C58.1 3759.01,4429.09 3759.01,4516.5 U14.6 3778.34,4601.18 3778.34,4860.24 C47.1 3701.02,4937.56 3701.02,4982.13 v1(3731.02,5012.13) ; C36.1 3708.27,5442.13 v1(3701.02,5442.13) 3701.02,5482.13 U10.6 3761.02,5642.13 3761.02,5901.18 C21.1 3698.35,5963.86 3698.35,6041.26 3761.02,6103.94 U8.6 ; 3758.34,6101.26 3758.34,6605.28 3814.33,6661.26 3814.33,6751.26 3824.33,6761.26 3904.1,6761.26 C91.1 4174.21,6991.14 4254.21,6991.14 v1(4264.21,7001.14) ; U12.6 3811.02,5102.13 3861.02,5152.13 v1(3871.02,5152.13) ; v1(5227.59,7004.53) 5227.59,7014.53 5257.59,7044.53 5481.36,7044.53 U4.5 5561.36,7044.53 5687.36,7044.53 C20.1 5745.94,6985.95 5792.64,6985.95 R8.1
  Bottom Layer w10: v1(3701.02,5442.13) 3801.02,5342.13 3801.02,5222.13 3866.7,5156.45 v1(3871.02,5152.13) v1(3731.02,5012.13) ; v1(4264.21,7001.14) 5224.21,7001.14 v1(5227.59,7004.53)
+5V6: C6.1 C7.1 C8.1 C10.1 C11.1 C15.1 C16.1 L1.2 R1.1 R3.2 U1.14 U2.1 U2.2 U2.3 U2.4 U2.7 U3.1 U3.2 U3.3 U3.7 | length 4422.4
  Top Layer w8.89: U3.7 4608.31,6970.24 4829.45,6970.24 4849.45,6990.24 4849.45,7014.76 4959.45,7124.76 v1(4969.45,7124.76) ; U1.14 4589.45,7278.37 4589.45,7294.76 4579.45,7304.76 4579.45,7314.76 4599.45,7334.76 4619.45,7334.76 4649.45,7304.76 v1(4649.45,7294.76)
  Top Layer w10: C10.1 4073.94,7035.95 4164.06,7035.95 C11.1 4234.06,7065.95 4808.27,7065.95 4849.45,7024.76 4849.45,7014.76 ; U3.1 U3.2 U3.3 v1(4491.54,6862.88) ; U3.7 4578.31,7000.24 v1(4578.31,6929.65) ; v1(4909.45,7184.76) 4889.45,7184.76 L1.2 4880.51,7214.76 R1.1 ; v1(4969.45,7124.76) 4969.45,7114.76 5019.45,7064.76 5019.45,7010.98 C15.1 ; 5019.45,7034.76 5029.45,7044.76 5125.71,7044.76 C16.1 5344.53,7205.95 5672.48,7205.95 C6.1 5771.3,7224.76 5860.2,7224.76 C7.1 5940.19,7304.76 6036.97,7304.76 C8.1 6086.5,7255.24 6173.35,7255.24 R3.2 ; 6183.35,7265.24 v1(6193.35,7255.24) ; v1(6243.35,7205.24) 6243.35,7118.66 U2.1 U2.2 U2.3 U2.4 6346.26,7123.5 6356.26,7133.5 6386.26,7133.5 6406.26,7153.5 6406.26,7270.71 U2.7
  In2.Cu w8.89: v1(4649.45,7294.76) 4759.45,7184.76 v1(4909.45,7184.76)
  In2.Cu w10: v1(4909.45,7184.76) v1(4969.45,7124.76)
  Bottom Layer w10: v1(4491.54,6862.88) 4558.31,6929.65 v1(4578.31,6929.65) ; v1(6193.35,7255.24) v1(6243.35,7205.24)
+5V_LNA: C12.1 C13.1 C19.1 C38.1 C39.1 C49.1 C50.1 C60.1 C61.1 C71.1 C72.1 C82.1 C83.1 C93.1 C94.1 L5.1 L9.1 L13.1 L17.1 L21.1 L25.1 U2.10 U2.11 U2.12 U4.1 U4.3 | length 7452.1
  Top Layer w10: C12.1 C12.1@4309.1,6998.94 ; C83.1 C93.1 ; C61.1 C71.1 ; C39.1 C49.1 ; C13.1 C38.1@4372.91,6217.32 ; v1(4339.1,6968.94) C12.1@4309.1,6998.94 ; 4400.08,4651.89 4390.08,4651.89 4320.08,4581.89 4320.08,4334.41 4400.08,4254.41 4400.08,4200.08 C82.1 C72.1 4318.9,3980.08 4328.9,3970.08 4368.9,3970.08 ; L25.1 4373.72,3658.27 C93.1 ; L21.1 4456.69,4057.87 4368.9,3970.08 ; L17.1 4453.05,4598.92 C71.1 ; L13.1 4456.69,5081.5 4368.9,4993.7 ; U4.3 5449.88,6929.73 5494.69,6974.53 ; U4.1 5464.69,7004.53 5494.69,6974.53 ; C19.1 C19.1@5609.1,7008.94 ; v1(5629.1,6988.94) C19.1@5609.1,7008.94 ; v1(5719.1,7058.94) 6048.51,7058.94 U2.12 U2.11 U2.10 ; C12.1@4309.1,6998.94 4309.1,6978.94 4099.1,6768.94 4058.7,6768.94 C94.1 4030.91,6605.31 4280.91,6355.31 4430.91,6355.31 4440.91,6345.31 4440.91,6315.31 4430.91,6305.31 4430.91,6275.31 C38.1@4372.91,6217.32 ; 4368.9,3970.08 4368.9,3740.08 4398.9,3710.08 4398.9,3687.09 C93.1 ; 4368.9,4993.7 4328.9,4993.7 4318.9,5003.7 C50.1 C60.1 4456.69,5280.32 L9.1 4373.72,5705.51 C49.1 ; 4368.9,4993.7 4368.9,4763.7 4398.9,4733.7 4398.9,4710.71 C71.1 ; C49.1 4456.69,5792.13 4456.69,6134.35 4373.72,6217.32 C38.1@4372.91,6217.32 ; 5494.69,6974.53 5544.69,6974.53 5579.1,7008.94 C19.1@5609.1,7008.94
  Bottom Layer w10: v1(4339.1,6968.94) 5229.1,6968.94 5259.1,6998.94 5619.1,6998.94 v1(5629.1,6988.94) 5659.1,7018.94 5699.1,7058.94 v1(5719.1,7058.94)
+5V_NS: C17.1 C18.1 C23.1 C24.1 C27.1 C28.1 C31.1 C32.1 L2.1 L3.1 L4.1 R10.1 U3.10 U3.11 U3.12 | length 3808.7
  Top Layer w10: C18.1 4232.4,6556.81 4282.4,6556.81 C23.1@4312.4,6526.81 ; C23.1 C23.1@4312.4,6526.81 ; U3.10 U3.11 U3.12 4419.96,6990.24 4419.96,6769.51 L2.1 ; C27.1 C27.1@4524.78,6534.69 ; 4534.78,6554.69 4607.91,6554.69 C28.1 4662.48,6560.12 4709.17,6560.12 C31.1 4769.17,6560.12 4815.87,6560.12 C32.1 ; C17.1 5274.78,7002.58 5274.78,6694.69 ; 6088.32,6694.69 6088.32,6739.11 R10.1 ; L4.1 6101.87,6694.69 5398.33,6694.69 L3.1 5298.33,6694.69 5204.78,6694.69 5194.78,6704.69 4604.78,6704.69 L2.1 ; C23.1@4312.4,6526.81 4339.1,6500.12 4389.1,6500.12 C24.1 4444.53,6504.69 4494.78,6504.69 C27.1@4524.78,6534.69 ; C27.1@4524.78,6534.69 4534.78,6544.69 4534.78,6574.69 4544.78,6584.69 L2.1
+12V: C1.1 C3.1 C4.1 C5.1 D1.1 U1.10 U1.11 U1.12 U1.13 | length 1863.9
  Top Layer w8.89: C1.1 4363.33,7308.01 4503.39,7308.01 v1(4513.39,7298.01) ; v1(4609.49,7308.01) 4609.49,7278.01 U1.13 U1.12 ; U1.10 U1.11 U1.12 ; C3.1 5216.81,7334.76 4724.23,7334.76 U1.12
  Top Layer w10: D1.1 4076.21,7187.58 4242.89,7187.58 C1.1 ; C3.1 5326.81,7304.76 5415.71,7304.76 C4.1 5495.71,7304.76 5592.48,7304.76 C5.1
  Bottom Layer w8.89: v1(4513.39,7298.01) 4599.49,7298.01 v1(4609.49,7308.01)
BUCK5V6_FB: R1.2 R2.1 U1.5 | length 644.3
  Top Layer w8.89: U1.5 4541.38,7151.91 4541.38,7141.91 4551.38,7131.91 4897.82,7131.91 4990.75,7224.84 R1.2
  Top Layer w10: R1.2 R2.1
BUCK5V6_SS: C2.1 U1.9 | length 628.5
  Top Layer w8.89: U1.9 4658.48,7189.96 4688.48,7219.96 4688.48,7279.96 4723.76,7315.24 5137.52,7315.24 C2.1
BUCK5V6_SW: L1.1 U1.1 U1.2 U1.3 | length 332.3
  Top Layer w8.89: v1(4494.25,7209.65) U1.3 U1.2 U1.1 ; v1(4694.25,7189.65) 4719.37,7214.76 L1.1
  Bottom Layer w8.89: v1(4494.25,7209.65) 4514.25,7189.65 v1(4694.25,7189.65)
CAL_EN: J2.1 R9.1 U3.4 U8.4 U10.4 U12.4 U14.4 U16.4 U18.4 | length 5623.5
  Top Layer w10: U18.4 3882.2,3564.88 3882.2,4046.69 3872.2,4056.69 ; U16.4 3872.2,4056.69 ; U12.4 3872.2,5082.13 ; v1(3882.2,4066.69) 3872.2,4056.69 ; v1(3882.2,4568.51) U14.4 3882.2,4588.51 3882.2,5072.13 3872.2,5082.13 ; v1(3882.2,5092.13) 3872.2,5082.13 ; v1(3882.2,5582.13) 3872.2,5592.13 U10.4 3862.2,5612.48 3782.2,5692.48 3782.2,5912.48 3882.2,6012.48 3882.2,6083.94 U8.4 3862.2,6124.29 v1(3902.2,6164.29) ; v1(4482.2,6744.29) 4517.13,6779.21 U3.4 ; J2.1 6205.32,6964.37 R9.1
  In2.Cu w10: v1(3882.2,4066.69) v1(3882.2,4568.51) ; v1(3882.2,5092.13) 3902.2,5112.13 3902.2,5562.13 v1(3882.2,5582.13) ; v1(3902.2,6164.29) 4458.98,6721.07 v1(4482.2,6744.29)
  Bottom Layer w10: v1(4482.2,6744.29) 5915.16,6744.29 J2.1
CH0_ANT: C34.1 J3.5 | length 325.6
  Top Layer w10: J3.5 C34.1
CH0_CAL: C35.1 R21.2 | length 200.7
  Top Layer w10: C35.1 3864.64,6223.7 3864.64,6243.7 3844.64,6263.7 3814.64,6263.7 3804.64,6273.7 3804.64,6297.16 R21.2
  other v1: 3826.77,6326.77
CH0_F0: C40.2 C41.1 L6.1 | length 379
  Top Layer w10: C40.2 4735.63,6070.86 L6.1 4893.9,6146.26 C41.1
CH0_F2: C41.2 C42.1 L7.1 | length 379
  Top Layer w10: C41.2 5089.76,6070.86 C42.1 5247.83,6146.46 L7.1
CH0_F4: C43.1 L7.2 L8.1 | length 378.8
  Top Layer w10: L7.2 5437.2,6146.46 C43.1 5602.16,6146.46 L8.1
CH0_F6: C44.1 J4.5 L8.2 | length 1008.1
  Top Layer w10: L8.2 5791.53,6146.46 C44.1 5949.6,6070.86 J4.5
CH0_LNA_IN: C37.2 U9.3 | length 216.5
  Top Layer w10: C37.2 4107.48,6096.46 U9.3
CH0_LNA_OUT: C40.1 L5.2 U9.1 | length 428.9
  Top Layer w10: U9.1 4359.37,6045.27 4384.96,6070.86 v1(4384.96,6100.86) ; L5.2 4479.47,6196.36 4604.96,6070.86 C40.1 ; v1(4484.96,6170.86) 4494.96,6180.86
  In2.Cu w10: v1(4384.96,6100.86) 4454.96,6170.86 v1(4484.96,6170.86)
CH0_SW_C: C37.1 U8.5 | length 325.5
  Top Layer w10: U8.5 3836.61,6154.29 3876.61,6194.29 3920.67,6194.29 C37.1
CH0_SW_RF1: C35.2 U8.1 | length 203.5
  Top Layer w10: U8.1 v1(3811.02,6068.15) ; v1(3811.02,6138.15) 3811.02,6207.87 C35.2
  Bottom Layer w10: v1(3811.02,6068.15) v1(3811.02,6138.15)
CH0_SW_RF2: C34.2 U8.3 | length 274
  Top Layer w10: C34.2 3642.4,6067.44 v1(3692.2,6067.44) ; v1(3732.2,6037.44) 3762.2,6007.44 3852.2,6007.44 3862.2,6017.44 U8.3
  In2.Cu w10: v1(3692.2,6067.44) 3722.2,6037.44 v1(3732.2,6037.44)
CH1_ANT: C45.1 J5.5 | length 325.6
  Top Layer w10: J5.5 C45.1
CH1_CAL: C46.1 R22.2 | length 158.3
  Top Layer w10: C46.1 3864.64,5711.89 3864.64,5785.35 R22.2
  other v1: 3826.77,5814.96
CH1_F0: C51.2 C52.1 L10.1 | length 379
  Top Layer w10: C51.2 4735.63,5559.05 L10.1 4893.9,5634.45 C52.1
CH1_F2: C52.2 C53.1 L11.1 | length 379
  Top Layer w10: C52.2 5089.76,5559.05 C53.1 5247.83,5634.65 L11.1
CH1_F4: C54.1 L11.2 L12.1 | length 378.8
  Top Layer w10: L11.2 5437.2,5634.65 C54.1 5602.16,5634.65 L12.1
CH1_F6: C55.1 J6.5 L12.2 | length 1008.1
  Top Layer w10: L12.2 5791.53,5634.65 C55.1 5949.6,5559.05 J6.5
CH1_LNA_IN: C48.2 U11.3 | length 216.5
  Top Layer w10: C48.2 4107.48,5584.65 U11.3
CH1_LNA_OUT: C51.1 L9.2 U11.1 | length 417.2
  Top Layer w10: U11.1 4359.37,5533.46 v1(4384.96,5559.05) ; L9.2 4462.19,5679.05 4494.96,5679.05 C51.1 ; v1(4484.96,5659.05) 4484.96,5679.05
  In2.Cu w10: v1(4384.96,5559.05) v1(4484.96,5659.05)
CH1_SW_C: C48.1 U10.5 | length 233.1
  Top Layer w10: U10.5 3836.61,5571.77 3849.33,5559.05 C48.1
CH1_SW_RF1: C46.2 U10.1 | length 209.5
  Top Layer w10: U10.1 v1(3811.02,5556.34) ; v1(3811.02,5706.34) 3821.3,5706.34 C46.2
  Bottom Layer w10: v1(3811.02,5556.34) v1(3811.02,5706.34)
CH1_SW_RF2: C45.2 U10.3 | length 409.7
  Top Layer w10: C45.2 3642.2,5555.83 3642.2,5465.63 3712.2,5395.63 3752.2,5395.63 3862.2,5505.63 U10.3
CH2_ANT: C56.1 J7.5 | length 325.6
  Top Layer w10: J7.5 C56.1
CH2_CAL: C57.1 R23.2 | length 158.3
  Top Layer w10: C57.1 3864.64,5200.08 3864.64,5273.54 R23.2
  other v1: 3826.77,5303.15
CH2_F0: C62.2 C63.1 L14.1 | length 379
  Top Layer w10: C62.2 4735.63,5047.24 L14.1 4893.9,5122.64 C63.1
CH2_F2: C63.2 C64.1 L15.1 | length 379
  Top Layer w10: C63.2 5089.76,5047.24 C64.1 5247.83,5122.84 L15.1
CH2_F4: C65.1 L15.2 L16.1 | length 378.8
  Top Layer w10: L15.2 5437.2,5122.84 C65.1 5602.16,5122.84 L16.1
CH2_F6: C66.1 J8.5 L16.2 | length 1008.1
  Top Layer w10: L16.2 5791.53,5122.84 C66.1 5949.6,5047.24 J8.5
CH2_LNA_IN: C59.2 U13.3 | length 216.5
  Top Layer w10: C59.2 4262.21,5047.24 U13.3
CH2_LNA_OUT: C62.1 L13.2 U13.1 | length 408.9
  Top Layer w10: U13.1 4359.37,5021.65 4384.96,5047.24 4384.96,5087.24 L13.2@4464.96,5167.24 ; L13.2 4462.19,5167.24 4494.96,5167.24 C62.1
CH2_SW_C: C59.1 U12.5 | length 266.5
  Top Layer w10: U12.5 3836.61,5100.67 3856.61,5120.67 3970.67,5120.67 C59.1
CH2_SW_RF1: C57.2 U12.1 | length 220.1
  Top Layer w10: U12.1 3791.02,5034.17 3791.02,5164.25 C57.2
CH2_SW_RF2: C56.2 U12.3 | length 274
  Top Layer w10: C56.2 3642.4,5043.82 3742.2,5043.82 3802.2,4983.82 3852.2,4983.82 3862.2,4993.82 U12.3
CH3_ANT: C67.1 J9.5 | length 325.6
  Top Layer w10: J9.5 C67.1
CH3_CAL: C68.1 R24.2 | length 158.3
  Top Layer w10: C68.1 3864.64,4688.27 3864.64,4761.73 R24.2
  other v1: 3826.77,4791.34
CH3_F0: C73.2 C74.1 L18.1 | length 379
  Top Layer w10: C73.2 4735.63,4535.43 L18.1 4893.9,4610.83 C74.1
CH3_F2: C74.2 C75.1 L19.1 | length 379
  Top Layer w10: C74.2 5089.76,4535.43 C75.1 5247.83,4611.03 L19.1
CH3_F4: C76.1 L19.2 L20.1 | length 378.8
  Top Layer w10: L19.2 5437.2,4611.03 C76.1 5602.16,4611.03 L20.1
CH3_F6: C77.1 J10.5 L20.2 | length 1008.1
  Top Layer w10: L20.2 5791.53,4611.03 C77.1 5949.6,4535.43 J10.5
CH3_LNA_IN: C70.2 U15.3 | length 216.5
  Top Layer w10: C70.2 4262.21,4535.43 U15.3
CH3_LNA_OUT: C73.1 L17.2 U15.1 | length 438.9
  Top Layer w10: U15.1 4419.37,4509.84 4524.96,4615.43 4524.96,4625.43 ; L17.2 4489.47,4660.93 C73.1
CH3_SW_C: C70.1 U14.5 | length 233.1
  Top Layer w10: U14.5 3836.61,4548.15 3846.61,4538.15 4041.38,4538.15 C70.1
CH3_SW_RF1: C68.2 U14.1 | length 225.6
  Top Layer w10: U14.1 v1(3811.02,4532.72) ; v1(3831.02,4602.72) 3804.64,4629.1 3804.64,4666.89 C68.2
  Bottom Layer w10: v1(3811.02,4532.72) 3811.02,4582.72 v1(3831.02,4602.72)
CH3_SW_RF2: C67.2 U14.3 | length 274
  Top Layer w10: C67.2 3642.4,4532.01 v1(3742.2,4532.01) ; v1(3782.2,4492.01) 3802.2,4472.01 3852.2,4472.01 3862.2,4482.01 U14.3
  Bottom Layer w10: v1(3742.2,4532.01) v1(3782.2,4492.01)
CH4_ANT: C78.1 J11.5 | length 325.6
  Top Layer w10: J11.5 C78.1
CH4_CAL: C79.1 R25.2 | length 158.3
  Top Layer w10: C79.1 3864.64,4176.46 3864.64,4249.92 R25.2
  other v1: 3826.77,4279.53
CH4_F0: C84.2 C85.1 L22.1 | length 379
  Top Layer w10: C84.2 4735.63,4023.62 L22.1 4893.9,4099.01 C85.1
CH4_F2: C85.2 C86.1 L23.1 | length 379
  Top Layer w10: C85.2 5089.76,4023.62 C86.1 5247.83,4099.21 L23.1
CH4_F4: C87.1 L23.2 L24.1 | length 378.8
  Top Layer w10: L23.2 5437.2,4099.21 C87.1 5602.16,4099.21 L24.1
CH4_F6: C88.1 J12.5 L24.2 | length 1008.1
  Top Layer w10: L24.2 5791.53,4099.21 C88.1 5949.6,4023.62 J12.5
CH4_LNA_IN: C81.2 U17.3 | length 216.5
  Top Layer w10: C81.2 4262.21,4023.62 U17.3
CH4_LNA_OUT: C84.1 L21.2 U17.1 | length 408.8
  Top Layer w10: U17.1 4355.61,3998.03 4386.69,4029.11 4386.69,4079.11 L21.2 4582.19,4023.62 C84.1
CH4_SW_C: C81.1 U16.5 | length 266.5
  Top Layer w10: U16.5 3836.61,4077.05 3856.61,4097.05 3970.67,4097.05 C81.1
CH4_SW_RF1: C79.2 U16.1 | length 225.3
  Top Layer w10: U16.1 v1(3811.02,4020.9) ; v1(3831.02,4110.9) 3804.64,4137.28 3804.64,4154.25 C79.2
  In2.Cu w10: v1(3811.02,4020.9) 3811.02,4090.9 v1(3831.02,4110.9)
CH4_SW_RF2: C78.2 U16.3 | length 274
  Top Layer w10: C78.2 3642.4,4020.2 v1(3742.2,4020.2) ; v1(3782.2,3980.2) 3802.2,3960.2 3852.2,3960.2 3862.2,3970.2 U16.3
  In2.Cu w10: v1(3742.2,4020.2) v1(3782.2,3980.2)
CH5_ANT: C89.1 J13.5 | length 325.6
  Top Layer w10: J13.5 C89.1
CH5_CAL: C90.1 R26.2 | length 158.3
  Top Layer w10: C90.1 3864.64,3664.65 3864.64,3738.11 R26.2
  other v1: 3826.77,3767.72
CH5_F0: C95.2 C96.1 L26.1 | length 379
  Top Layer w10: C95.2 4735.63,3511.81 L26.1 4893.9,3587.2 C96.1
CH5_F2: C96.2 C97.1 L27.1 | length 379
  Top Layer w10: C96.2 5089.76,3511.81 C97.1 5247.83,3587.4 L27.1
CH5_F4: C98.1 L27.2 L28.1 | length 378.8
  Top Layer w10: L27.2 5437.2,3587.4 C98.1 5602.16,3587.4 L28.1
CH5_F6: C99.1 J14.5 L28.2 | length 1008.1
  Top Layer w10: L28.2 5791.53,3587.4 C99.1 5949.6,3511.81 J14.5
CH5_LNA_IN: C92.2 U19.3 | length 216.5
  Top Layer w10: C92.2 4262.21,3511.81 U19.3
CH5_LNA_OUT: C95.1 L25.2 U19.1 | length 438.9
  Top Layer w10: U19.1 4419.37,3486.22 4524.96,3591.81 4524.96,3601.81 ; L25.2 4489.47,3637.3 C95.1
CH5_SW_C: C92.1 U18.5 | length 233.1
  Top Layer w10: U18.5 3836.61,3524.53 3846.61,3514.53 4041.38,3514.53 C92.1
CH5_SW_RF1: C90.2 U18.1 | length 219.8
  Top Layer w10: U18.1 v1(3811.02,3509.09) ; v1(3831.02,3579.09) 3811.3,3598.82 3811.3,3649.09 C90.2
  Bottom Layer w10: v1(3811.02,3509.09) 3811.02,3559.09 v1(3831.02,3579.09)
CH5_SW_RF2: C89.2 U18.3 | length 409.7
  Top Layer w10: C89.2 3642.2,3508.58 3642.2,3418.39 3712.2,3348.39 3752.2,3348.39 3862.2,3458.39 U18.3
GND: C1.2 C2.2 C3.2 C4.2 C5.2 C6.2 C7.2 C8.2 C9.2 C10.2 C11.2 C12.2 C13.2 C14.2 C15.2 C16.2 C17.2 C18.2 C19.2 C20.2 C21.2 C23.2 C24.2 C27.2 C28.2 C31.2 C32.2 C36.2 C38.2 C39.2 C42.2 C43.2 C44.2 C47.2 C49.2 C50.2 C53.2 C54.2 C55.2 C58.2 C60.2 C61.2 C64.2 C65.2 C66.2 C69.2 C71.2 C72.2 C75.2 C76.2 C77.2 C80.2 C82.2 C83.2 C86.2 C87.2 C88.2 C91.2 C93.2 C94.2 C97.2 C98.2 C99.2 D2.1 D3.1 H1.1 H2.1 H3.1 H4.1 J1.2 J1.3 J2.2 J3.1 J3.2 J3.3 J3.4 J4.1 J4.2 J4.3 J4.4 J5.1 J5.2 J5.3 J5.4 J6.1 J6.2 J6.3 J6.4 J7.1 J7.2 J7.3 J7.4 J8.1 J8.2 J8.3 J8.4 J9.1 J9.2 J9.3 J9.4 J10.1 J10.2 J10.3 J10.4 J11.1 J11.2 J11.3 J11.4 J12.1 J12.2 J12.3 J12.4 J13.1 J13.2 J13.3 J13.4 J14.1 J14.2 J14.3 J14.4 L6.2 L10.2 L14.2 L18.2 L22.2 L26.2 R2.2 R4.2 R5.2 R6.2 R7.2 R9.2 R11.2 R12.2 R14.2 R15.2 R17.2 R18.2 R20.2 U1.6 U1.7 U1.8 U1.15 U1.16 U1.17 U2.9 U2.13 U3.9 U3.13 U4.2 U5.2 U5.4 U6.2 U6.4 U7.2 U7.4 U8.2 U9.2 U9.4 U10.2 U11.2 U11.4 U12.2 U13.2 U13.4 U14.2 U15.2 U15.4 U16.2 U17.2 U17.4 U18.2 U19.2 U19.4
  other v1: 3433.07,3255.91 3531.5,3255.91 3629.92,3255.91 3728.35,3255.91 3826.77,3255.91 3925.2,3255.91 4023.62,3255.91 4122.05,3255.91 4220.47,3255.91 4318.9,3255.91 4417.32,3255.91 4515.75,3255.91 4614.17,3255.91 4712.6,3255.91 4811.02,3255.91 4909.45,3255.91 5007.87,3255.91 5106.3,3255.91 5204.72,3255.91 5303.15,3255.91 5401.57,3255.91 5500,3255.91 5598.43,3255.91 5696.85,3255.91 5795.28,3255.91 5893.7,3255.91 5992.13,3255.91 6090.55,3255.91 6188.98,3255.91 6287.4,3255.91 6385.83,3255.91 6484.25,3255.91 3433.07,3767.72 3531.5,3767.72 3629.92,3767.72 3728.35,3767.72 3925.2,3767.72 4023.62,3767.72 4122.05,3767.72 4220.47,3767.72 4318.9,3767.72 4417.32,3767.72 4515.75,3767.72 4614.17,3767.72 4712.6,3767.72 4811.02,3767.72 4909.45,3767.72 5007.87,3767.72 5106.3,3767.72 5204.72,3767.72 5303.15,3767.72 5401.57,3767.72 5500,3767.72 5598.43,3767.72 5696.85,3767.72 5795.28,3767.72 5893.7,3767.72 5992.13,3767.72 6090.55,3767.72 6188.98,3767.72 6287.4,3767.72 6385.83,3767.72 6484.25,3767.72 3433.07,4279.53 3531.5,4279.53 3629.92,4279.53 3728.35,4279.53 3925.2,4279.53 4023.62,4279.53 4122.05,4279.53 4220.47,4279.53 4318.9,4279.53 4417.32,4279.53 4515.75,4279.53 4614.17,4279.53 4712.6,4279.53 4811.02,4279.53 4909.45,4279.53 5007.87,4279.53 5106.3,4279.53 5204.72,4279.53 5303.15,4279.53 5401.57,4279.53 5500,4279.53 5598.43,4279.53 5696.85,4279.53 5795.28,4279.53 5893.7,4279.53 5992.13,4279.53 6090.55,4279.53 6188.98,4279.53 6287.4,4279.53 6385.83,4279.53 6484.25,4279.53 3433.07,4791.34 3531.5,4791.34 3629.92,4791.34 3728.35,4791.34 3925.2,4791.34 4023.62,4791.34 4122.05,4791.34 4220.47,4791.34 4318.9,4791.34 4417.32,4791.34 4515.75,4791.34 4614.17,4791.34 4712.6,4791.34 4811.02,4791.34 4909.45,4791.34 5007.87,4791.34 5106.3,4791.34 5204.72,4791.34 5303.15,4791.34 5401.57,4791.34 5500,4791.34 5598.43,4791.34 5696.85,4791.34 5795.28,4791.34 5893.7,4791.34 5992.13,4791.34 6090.55,4791.34 6188.98,4791.34 6287.4,4791.34 6385.83,4791.34 6484.25,4791.34 3433.07,5303.15 3531.5,5303.15 3629.92,5303.15 3728.35,5303.15 3925.2,5303.15 4023.62,5303.15 4122.05,5303.15 4220.47,5303.15 4318.9,5303.15 4417.32,5303.15 4515.75,5303.15 4614.17,5303.15 4712.6,5303.15 4811.02,5303.15 4909.45,5303.15 5007.87,5303.15 5106.3,5303.15 5204.72,5303.15 5303.15,5303.15 5401.57,5303.15 5500,5303.15 5598.43,5303.15 5696.85,5303.15 5795.28,5303.15 5893.7,5303.15 5992.13,5303.15 6090.55,5303.15 6188.98,5303.15 6287.4,5303.15 6385.83,5303.15 6484.25,5303.15 3433.07,5814.96 3531.5,5814.96 3629.92,5814.96 3728.35,5814.96 3925.2,5814.96 4023.62,5814.96 4122.05,5814.96 4220.47,5814.96 4318.9,5814.96 4417.32,5814.96 4515.75,5814.96 4614.17,5814.96 4712.6,5814.96 4811.02,5814.96 4909.45,5814.96 5007.87,5814.96 5106.3,5814.96 5204.72,5814.96 5303.15,5814.96 5401.57,5814.96 5500,5814.96 5598.43,5814.96 5696.85,5814.96 5795.28,5814.96 5893.7,5814.96 5992.13,5814.96 6090.55,5814.96 6188.98,5814.96 6287.4,5814.96 6385.83,5814.96 6484.25,5814.96 3433.07,6326.77 3531.5,6326.77 3629.92,6326.77 3728.35,6326.77 3925.2,6326.77 4023.62,6326.77 4122.05,6326.77 4220.47,6326.77 4318.9,6326.77 4417.32,6326.77 4515.75,6326.77 4614.17,6326.77 4712.6,6326.77 4811.02,6326.77 4909.45,6326.77 5007.87,6326.77 5106.3,6326.77 5204.72,6326.77 5303.15,6326.77 5401.57,6326.77 5500,6326.77 5598.43,6326.77 5696.85,6326.77 5795.28,6326.77 5893.7,6326.77 5992.13,6326.77 6090.55,6326.77 6188.98,6326.77 6287.4,6326.77 6385.83,6326.77 6484.25,6326.77
LDO_LNA_ILIM: R5.1 U2.6 | length 2697.6
  Top Layer w10: R5.1 3953.82,7045.55 3970.68,7045.55 v1(4000.68,7015.55) ; v1(5300.67,6975.55) 5370.67,6905.55 5950.67,6905.55 6087.44,7042.32 6377.44,7042.32 6397.44,7062.32 U2.6
  In2.Cu w10: v1(4000.68,7015.55) 4070.68,6945.55 4280.67,6945.55 4350.67,7015.55 4393.27,7015.55 4433.27,6975.55 v1(5300.67,6975.55)
LDO_LNA_SET: C9.1 R4.1 U2.8 | length 3009.8
  Top Layer w10: C9.1 3831.86,7053.71 3831.86,7260.12 3921.86,7350.12 6331.85,7350.12 6371.85,7310.12 ; U2.8 6371.85,7310.12 ; R4.1 6428.31,7320.12 6381.85,7320.12 6371.85,7310.12
LDO_NS_ILIM: R7.1 U3.6 | length 405.5
  Top Layer w10: U3.6 4702.36,6823.62 R7.1
LDO_NS_SET: C14.1 R6.1 U3.8 | length 281.8
  Top Layer w10: U3.8 4542.72,7040.83 4552.72,7050.83 4602.72,7050.83 R6.1@4634.45,7019.1 ; R6.1 R6.1@4634.45,7019.1 ; C14.1 4737.72,6989.1 4664.45,6989.1 R6.1@4634.45,7019.1
LED_CAL: D3.2 R10.2 | length 2742.4
  Top Layer w10: D3.2 3864.98,6710.51 3974.98,6710.51 4004.98,6740.51 4004.98,6760.51 4214.98,6970.51 v1(4264.98,6970.51) ; v1(6384.97,6990.51) 6384.97,6995.6 R10.2
  In2.Cu w10: v1(4264.98,6970.51) 4274.98,6970.51 4334.98,7030.51 6344.97,7030.51 v1(6384.97,6990.51)
LED_PWR: D2.2 R8.2 | length 161.5
  Top Layer w10: R8.2 5882.16,7035.32 5973.25,7035.32 D2.2
NS_A0_IN: C22.2 U5.3 | length 143.5
  Top Layer w10: C22.2 4381.77,6625.32 4434.57,6625.32 U5.3@4468.7,6659.45
NS_A0_OUT: C25.1 L2.2 U5.1 | length 373.9
  Top Layer w10: U5.1 4417.52,6586.52 4436.79,6567.25 4486.79,6567.25 4496.79,6577.25 v1(4496.79,6634.69) ; v1(4576.79,6614.69) L2.2 4617.42,6655.32 C25.1
  In2.Cu w10: v1(4496.79,6634.69) 4516.79,6614.69 v1(4576.79,6614.69)
NS_A1_IN: C26.2 U6.3 | length 143.5
  Top Layer w10: C26.2 5185.31,6625.32 5238.11,6625.32 U6.3@5272.24,6659.45
NS_A1_OUT: C29.1 L3.2 U6.1 | length 325.2
  Top Layer w10: U6.1 5221.06,6583.96 5237.78,6567.25 5332.89,6567.25 L3.2 5420.96,6655.32 C29.1
NS_A2_IN: C30.2 U7.3 | length 143.5
  Top Layer w10: C30.2 5988.86,6625.32 6041.66,6625.32 U7.3@6075.79,6659.45
NS_A2_OUT: C33.1 L4.2 U7.1 | length 322.2
  Top Layer w10: U7.1 6024.61,6589.08 6046.44,6567.25 6136.44,6567.25 L4.2 6224.51,6655.32 C33.1
NS_P0_A: C25.2 R12.1 R13.1 | length 201.8
  Top Layer w10: C25.2 4791.93,6655.32 R12.1 4822.32,6684.92 4870.59,6684.92 R13.1
NS_P0_B: C26.1 R13.2 R14.1 | length 201.5
  Top Layer w10: R13.2 R14.1 5038.46,6625.32 5087.52,6625.32 C26.1
NS_P1_A: C29.2 R15.1 R16.1 | length 201.8
  Top Layer w10: C29.2 5595.47,6655.32 R15.1 5625.86,6624.92 5674.13,6624.92 R16.1
NS_P1_B: C30.1 R16.2 R17.1 | length 201.5
  Top Layer w10: R16.2 R17.1 5842.01,6625.32 5891.06,6625.32 C30.1
NS_P2_A: C33.2 R18.1 R19.1 | length 201.8
  Top Layer w10: C33.2 6399.02,6655.32 R18.1 6429.41,6624.92 6477.68,6624.92 R19.1
NS_P2_B: R19.2 R20.1 R21.1 R22.1 R23.1 R24.1 R25.1 R26.1 | length 7039.8
  Top Layer w10: v1(3827.55,5240.48) R23.1@3827.55,5270.48 ; R26.1 3830.08,3727.95 3794.64,3763.39 3794.64,3893.39 v1(3834.64,3933.39) ; R25.1 3828.27,4239.76 3794.64,4273.39 3794.64,4403.39 v1(3834.64,4443.39) ; R24.1 3826.45,4751.58 3794.64,4783.39 3794.64,4913.39 v1(3834.64,4953.39) ; R23.1 R23.1@3827.55,5270.48 ; R22.1 3825.2,5775.2 3799.92,5800.48 3799.92,5820.48 3819.92,5840.48 4039.92,5840.48 4269.92,6070.48 4309.92,6070.48 4319.92,6080.48 4319.92,6150.47 4289.92,6180.47 4289.92,6267.01 ; R21.1 4269.92,6287.01 4289.92,6267.01 ; 4049.92,5850.48 4289.92,5610.48 4309.92,5610.48 4319.92,5600.48 4319.92,5570.48 4309.92,5560.48 4239.92,5560.48 4009.92,5330.48 3819.92,5330.48 3799.92,5310.48 3799.92,5290.48 3819.92,5270.48 R23.1@3827.55,5270.48 ; v1(4399.92,6287.01) 4309.92,6287.01 4289.92,6267.01 ; v1(4459.92,6287.01) 6189.92,6287.01 6547.84,6644.92 R19.2 R20.1
  In2.Cu w10: v1(3827.55,5240.48) 3827.55,5004.26 3834.64,4997.17 v1(3834.64,4953.39) 3854.64,4933.39 3854.64,4514.65 3834.64,4494.65 v1(3834.64,4443.39) 3854.64,4423.39 3854.64,3953.39 v1(3834.64,3933.39) ; v1(4399.92,6287.01) v1(4459.92,6287.01)
NS_TERM: C22.1 R11.1 | length 133.4
  Top Layer w10: R11.1 4234.92,6625.32 4283.98,6625.32 C22.1
PG_5V6: R3.1 U1.4 | length 1815.8
  Top Layer w8.89: U1.4 4523.33,7139.96 4563.33,7099.96 4903.33,7099.96 5023.33,7219.96 5623.33,7219.96 5728.21,7324.84 6122.8,7324.84 R3.1
VIN_FUSED: D1.2 F1.2 | length 317.5
  Top Layer w10: F1.2 3926.18,7284.45 4136.81,7284.45 D1.2
VIN_RAW: F1.1 J1.1 | length 291.9
  Top Layer w10: J1.1 3679.13,7147.64 F1.1
pads on no net: U2.5 U3.5 U4.4

## Polygon pours and split planes (outlines as drawn)
+5V_LNA on In2.Cu (solid, remove dead copper): 3019.68,7389.76 6917.32,7389.76 6917.32,3019.68 3019.68,3019.68
GND on Top Layer (solid, remove dead copper, pour order 4): 3019.68,7389.76 6917.32,7389.76 6917.32,3019.68 3019.68,3019.68
GND on Bottom Layer (solid, remove dead copper, pour order 8): 3019.68,7389.76 6917.32,7389.76 6917.32,3019.68 3019.68,3019.68
GND on In1.Cu (solid, remove dead copper): 3019.68,7389.76 6917.32,7389.76 6917.32,3019.68 3019.68,3019.68

## Keep-outs
Board Outline Layer:
  the board outline again, w5.91